# Altium PCB Stepper-Driver-v2.0.PcbDoc (part 1 of 7)
Units mil, origin at the board's own origin, x right, y up, seen from the top; angles counter-clockwise.
Board outline 5905.51 x 4330.71 mil, 4 copper layers (Top Layer, Layer 1, Layer 2, Bottom Layer), stack 62.047 mil thick; 312 components, 285 nets, 1093 pads, 969 vias.
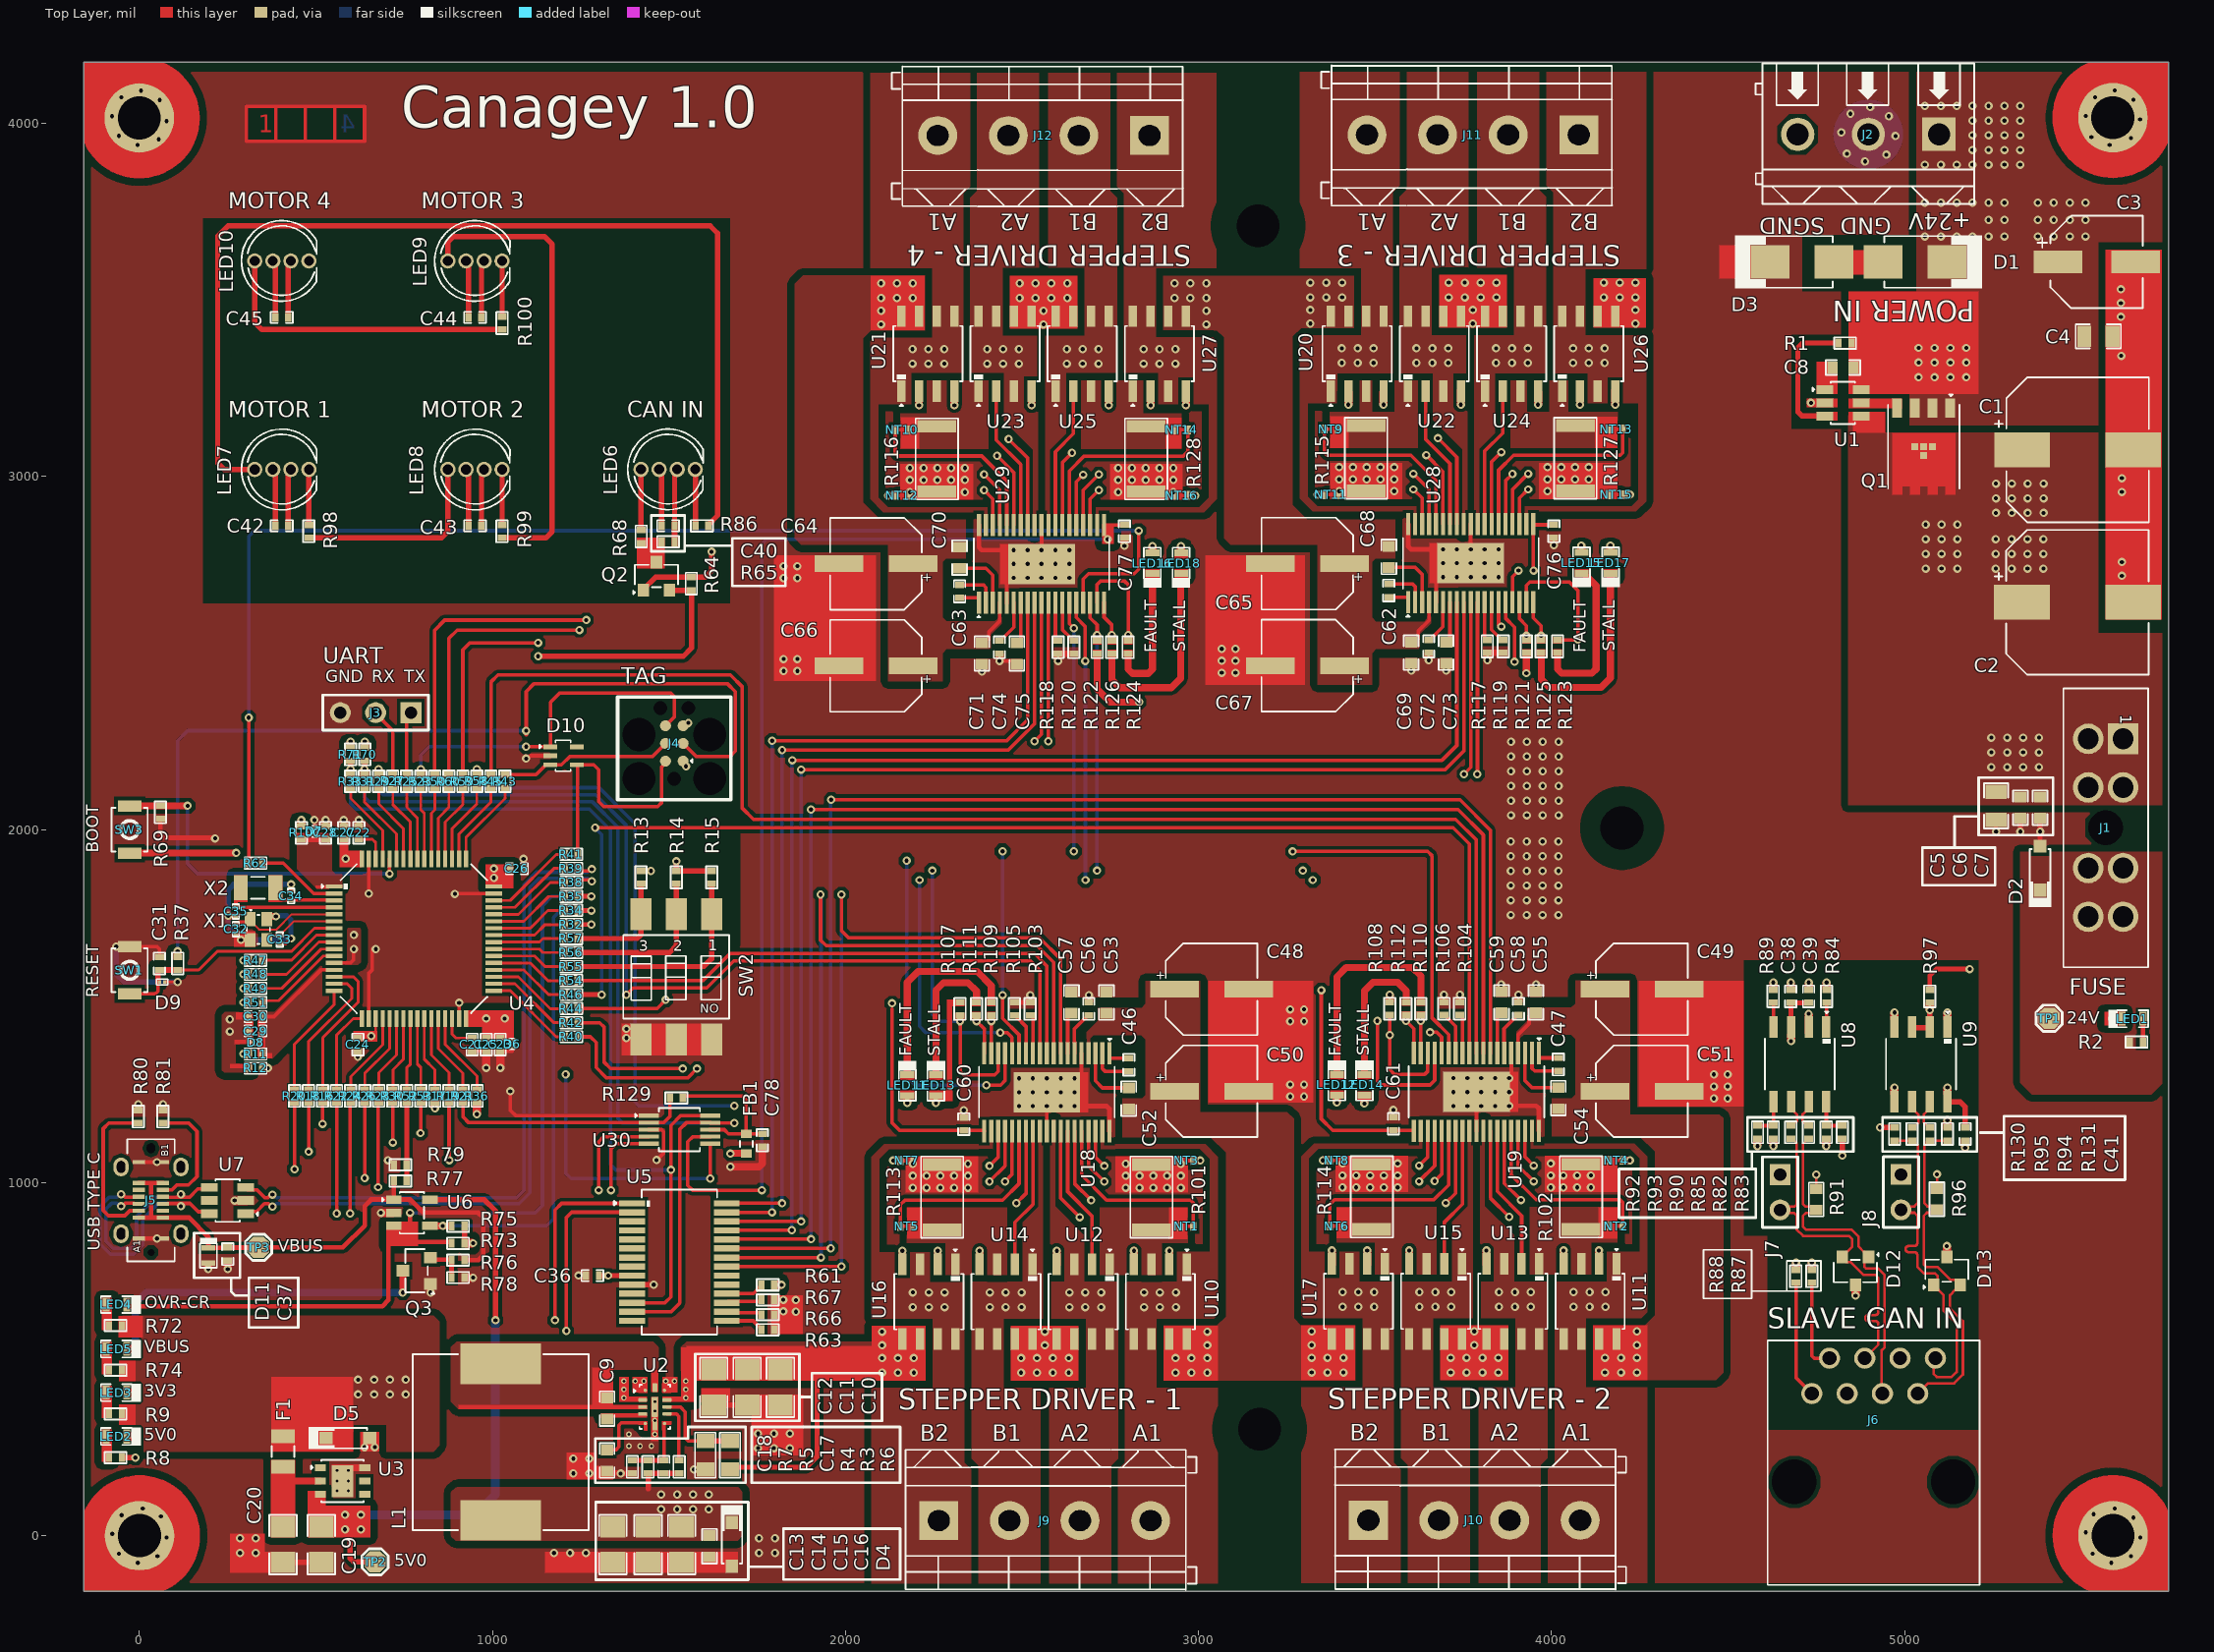
[diagram p0: Top Layer view]
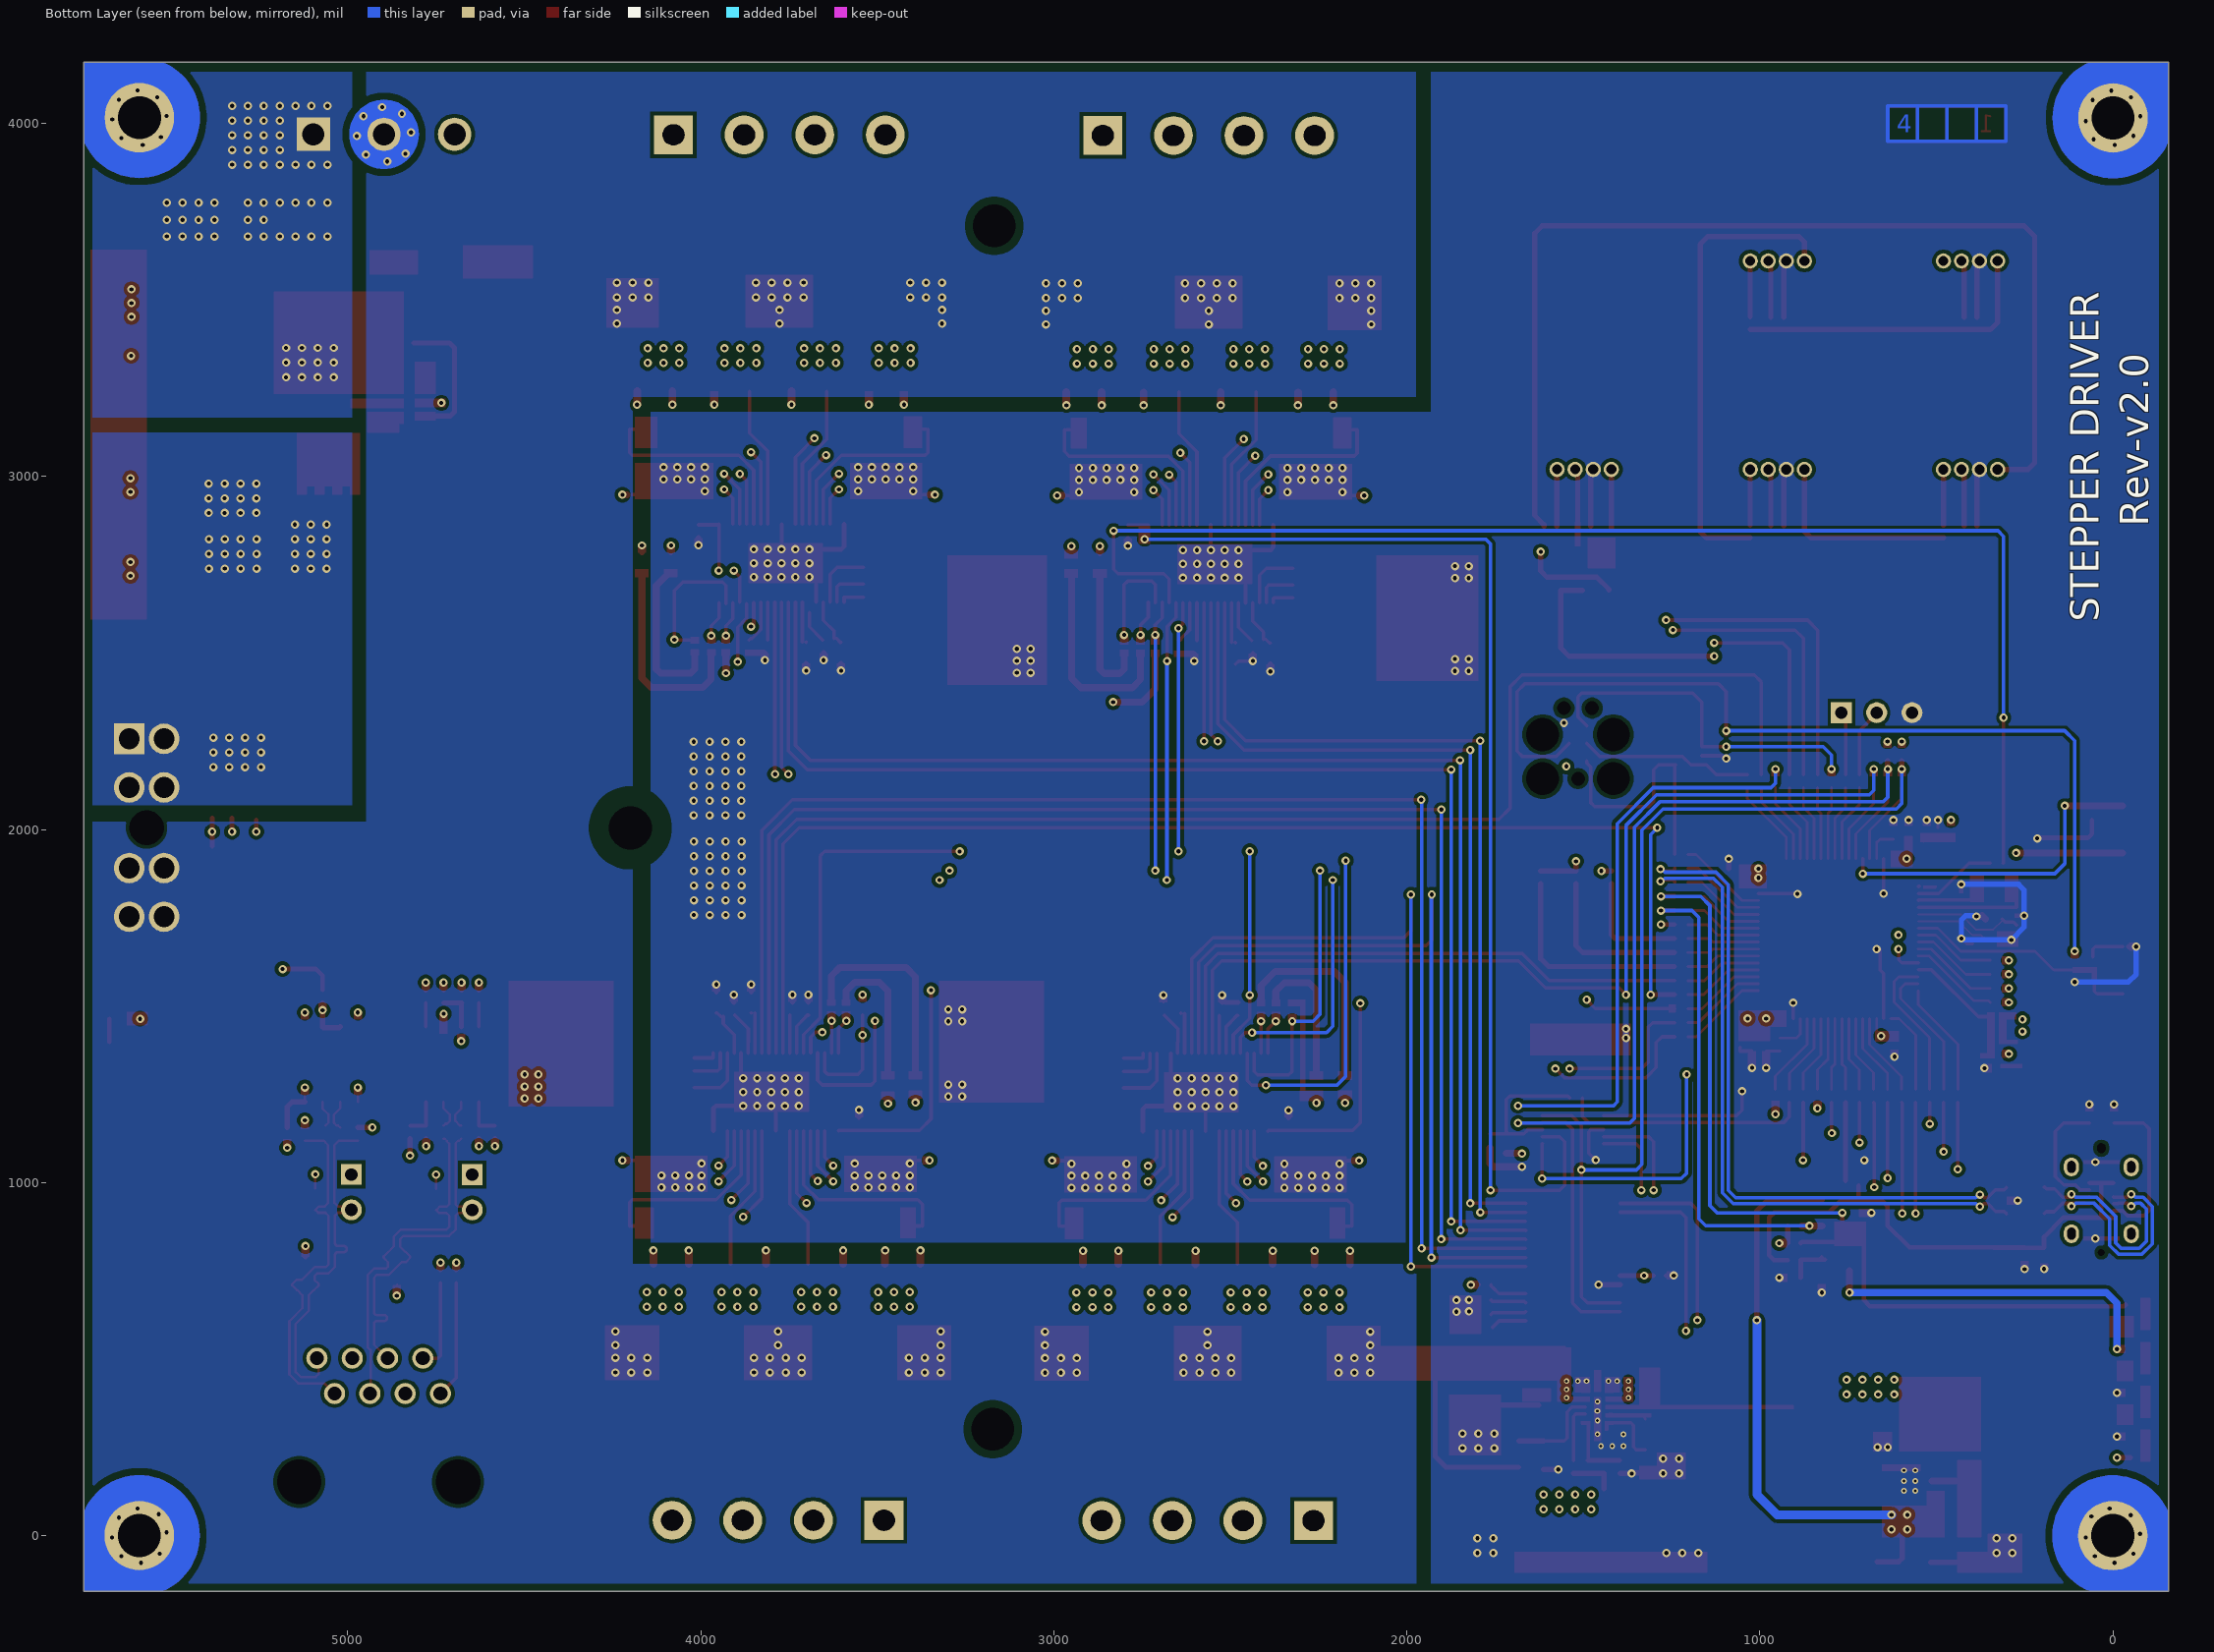
[diagram p1: Bottom Layer view, seen from below]
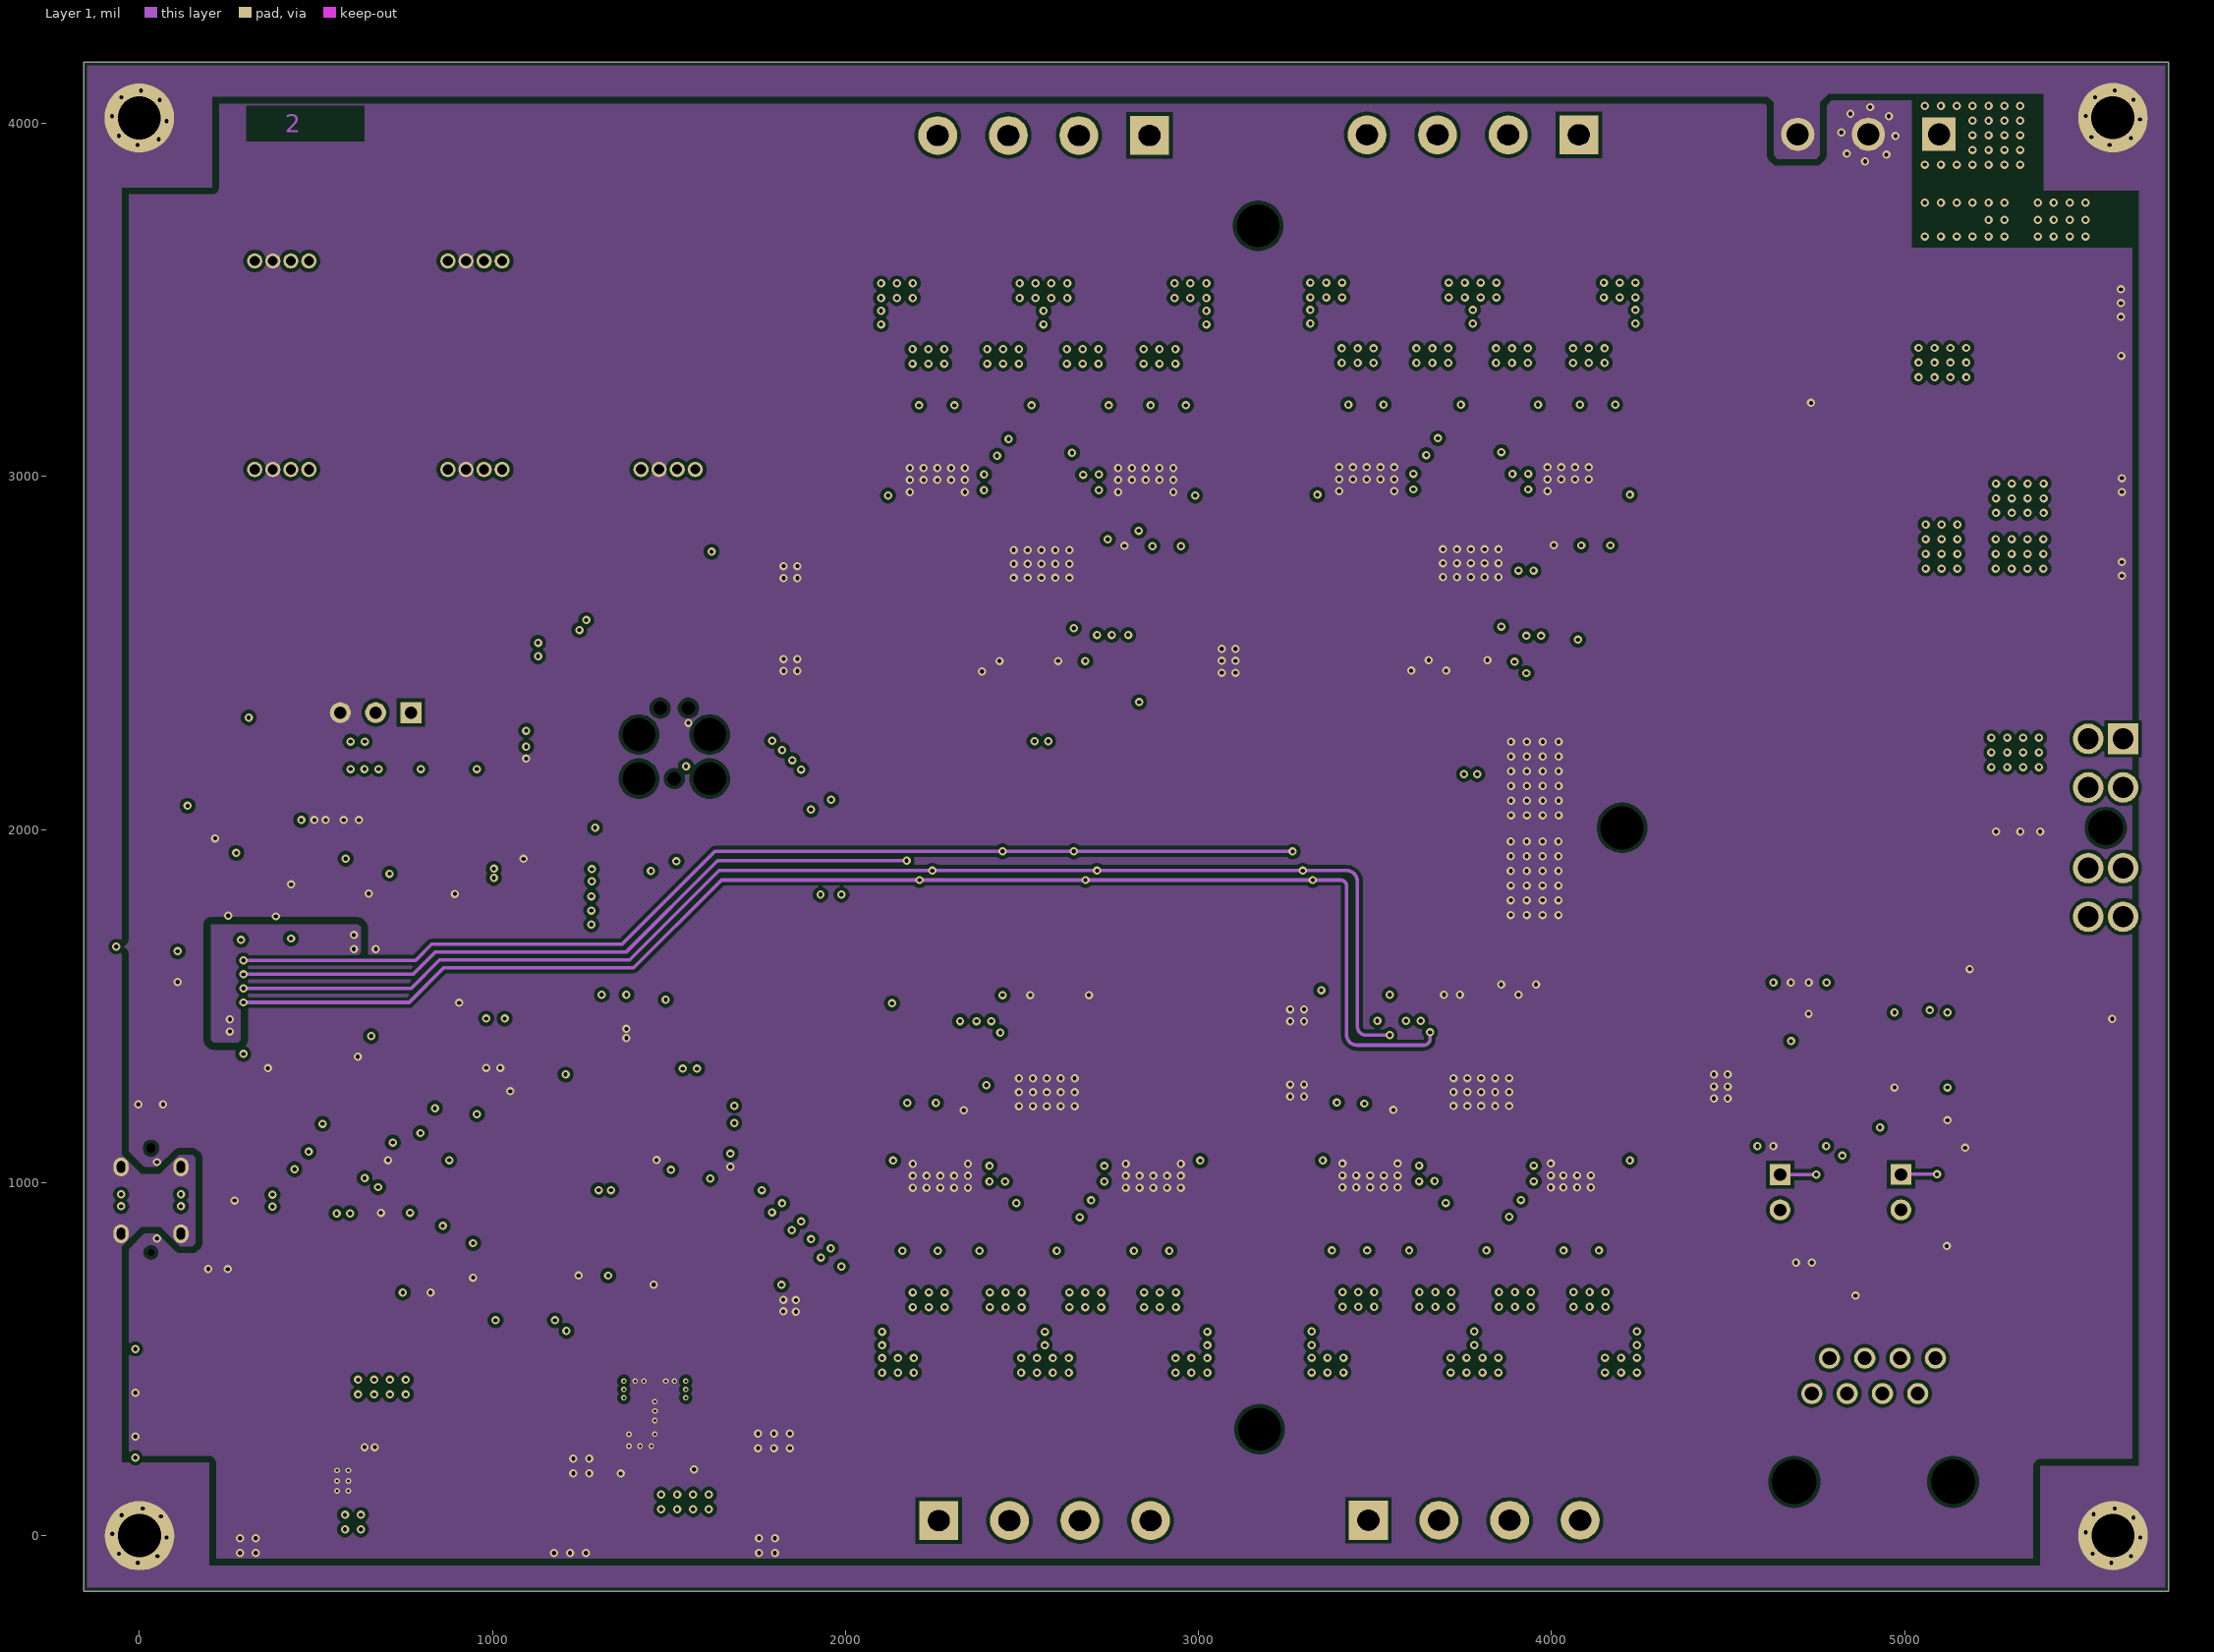
[diagram p2: Layer 1]
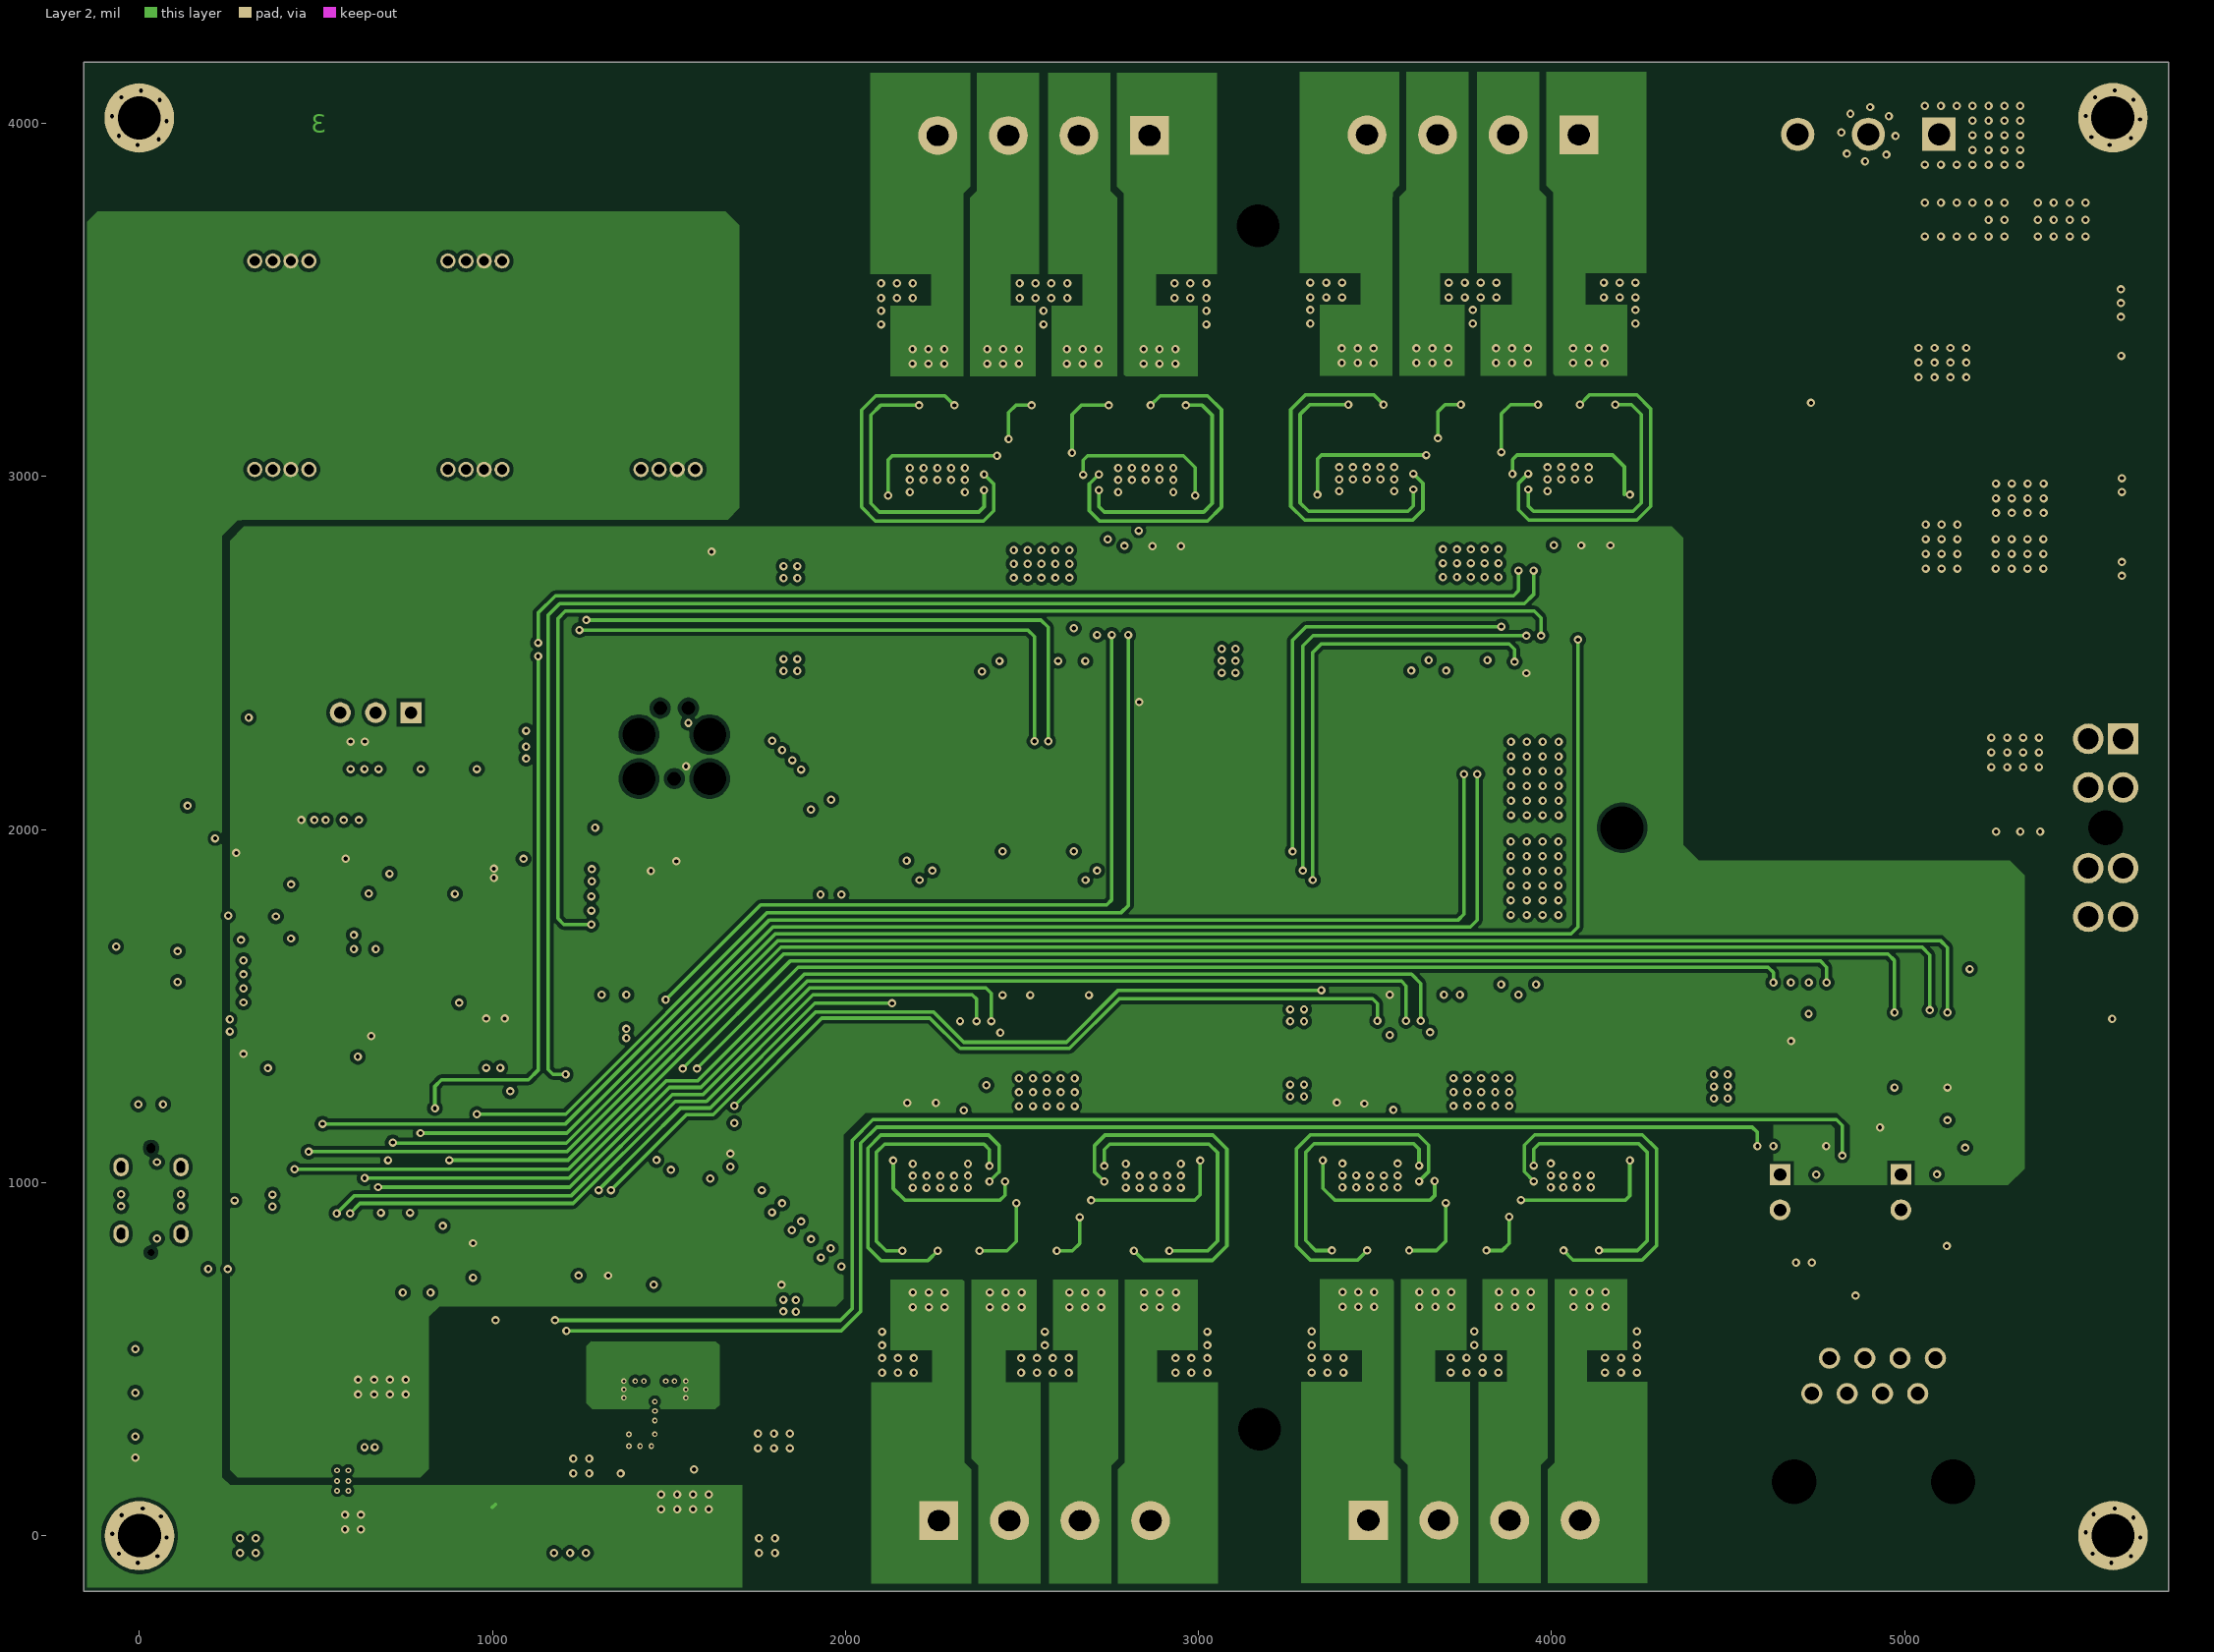
[diagram p3: Layer 2]
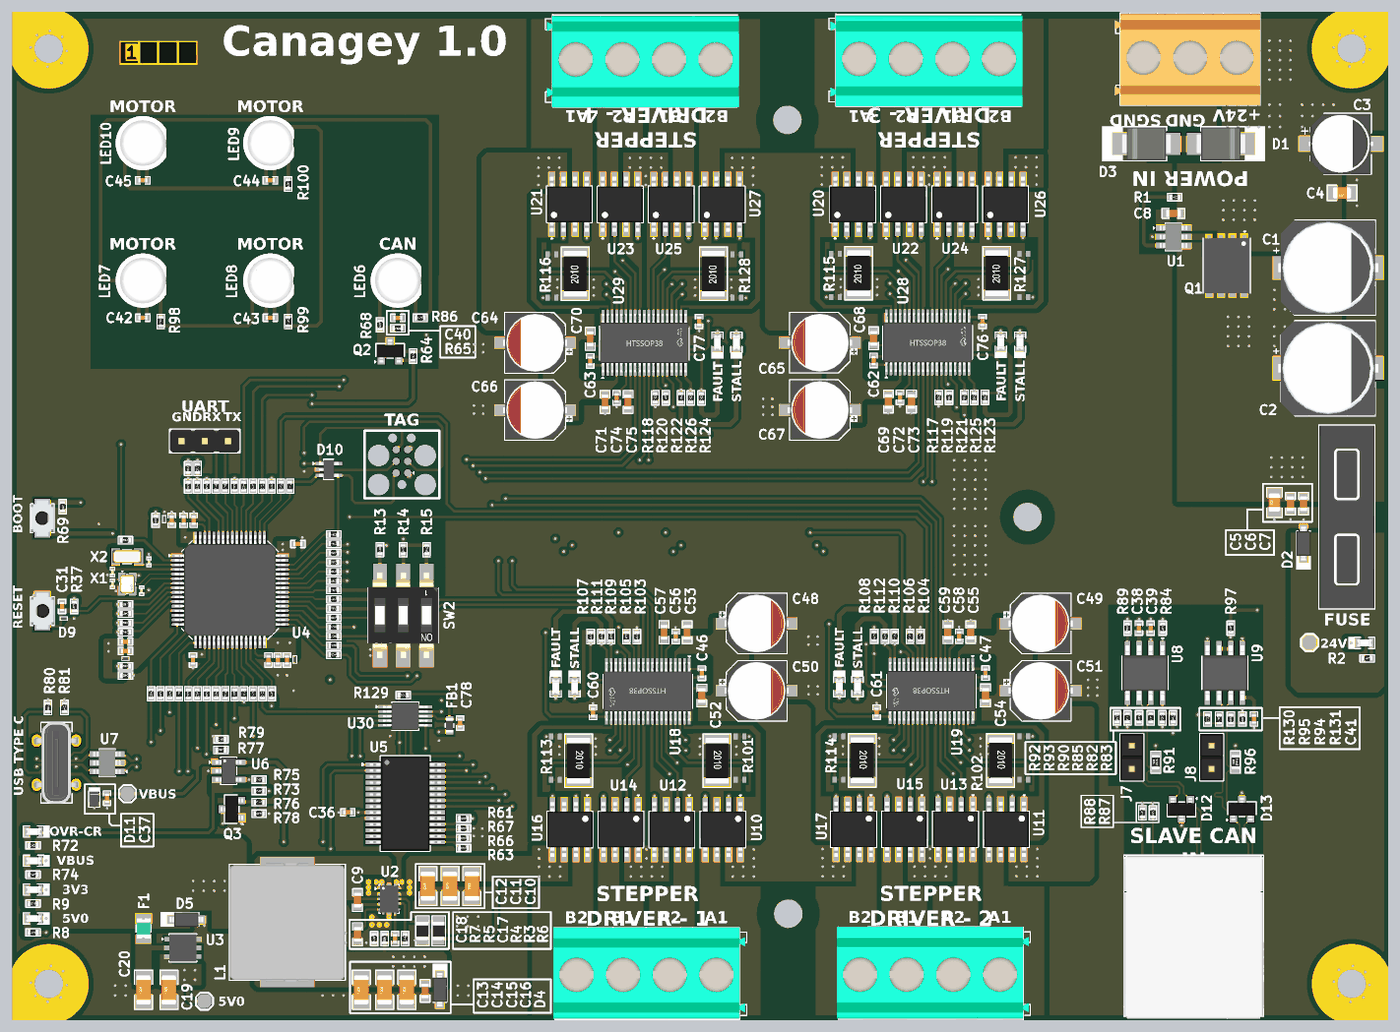
[diagram p8: 3D render of the assembled board from above, using the file's embedded part models]

## Layer stack, top to bottom
Top Solder: solder mask 0.4, Solder Resist, Dk 3.5
Top Layer: signal copper 1.378
Dielectric 2: prepreg 7.992, PP-006, Dk 4.4
Layer 1: signal copper 1.378
Dielectric 1: dielectric 40.551, FR-4, Dk 4.6
Layer 2: signal copper 1.378
Dielectric 3: prepreg 7.992, PP-006, Dk 4.4
Bottom Layer: signal copper 1.378
Bottom Solder: solder mask 0.4, Solder Resist, Dk 3.5

## Board outline
-157.85,-157.11 -157.85,4173.6 5747.66,4173.6 5747.66,-157.11

## Design rules (kind name [scope] priority, off if disabled: settings)
BoardOutlineClearance [All] p1: gap=0 ignorepadtopadclearanceinfootprint=FALSE except(10: Arc-OutlineEdge SMDPad-OutlineEdge THPad-OutlineEdge Via-OutlineEdge Fill-OutlineEdge Poly-OutlineEdge)
Clearance "Clearance_Diff Pair" [InAnyDifferentialPair] p1: gap=10 ignorepadtopadclearanceinfootprint=FALSE except(4: SMDPad-SMDPad; 5: Arc-Arc Arc-Track; 7: Arc-SMDPad Track-Track Track-SMDPad Track-Via THPad-THPad; 20: Poly-Region Region-Region)
Clearance [All] p2: gap=10 ignorepadtopadclearanceinfootprint=FALSE except(4: SMDPad-SMDPad; 7: Arc-SMDPad Arc-Fill Track-Track Track-SMDPad Track-Via Track-Fill Track-Region Track-Text SMDPad-Fill SMDPad-Region THPad-THPad Fill-Fill; 20: Fill-Poly Poly-Poly Poly-Region Region-Region)
Clearance Clearance_BOTTOM [OnLayer('Bottom Layer')] p3: gap=10 ignorepadtopadclearanceinfootprint=FALSE except(4: SMDPad-SMDPad; 7: Arc-SMDPad Track-SMDPad Track-Via THPad-THPad; 9: Track-Track; 20: Arc-Poly Track-Poly SMDPad-Poly THPad-Poly Via-Poly Fill-Poly Poly-Poly Poly-Region Region-Region)
DiffPairsRouting DIFF_USB [InDifferentialPairClass('DIFF_USB')] p1: maxlimit=10 minlimit=7 mostfreqgap=10 toplayer_maxgap=7 toplayer_prefgap=7 toplayer_minwidth=10 toplayer_maxwidth=10 toplayer_prefwidth=10 midlayer1_mingap=10 midlayer1_minwidth=7.5 midlayer1_maxwidth=7.5 midlayer1_prefwidth=7.5 midlayer2_mingap=10 midlayer2_minwidth=7.5 midlayer2_maxwidth=7.5 midlayer2_prefwidth=7.5 bottomlayer_maxgap=7 bottomlayer_prefgap=7 bottomlayer_minwidth=10 bottomlayer_maxwidth=10 bottomlayer_prefwidth=10 impedanceprofiledriven=TRUE impedanceprofileid={FF5DAFE1-98B4-493E-B4A7-3D2591EC31F9} impedanceprofilevalue=90.000000 maxuncoupledlength=500
DiffPairsRouting DIFF_CAN1 [InDifferentialPairClass('DIFF_CAN')] p2: maxlimit=15 minlimit=11 mostfreqgap=15 toplayer_maxgap=11 toplayer_prefgap=11 toplayer_minwidth=7 toplayer_maxwidth=7 toplayer_prefwidth=7 midlayer1_mingap=15 midlayer1_minwidth=4 midlayer1_maxwidth=4 midlayer1_prefwidth=4 midlayer2_mingap=15 midlayer2_minwidth=4 midlayer2_maxwidth=4 midlayer2_prefwidth=4 bottomlayer_maxgap=11 bottomlayer_prefgap=11 bottomlayer_minwidth=7 bottomlayer_maxwidth=7 bottomlayer_prefwidth=7 impedanceprofiledriven=TRUE impedanceprofileid={AF431588-A3C0-40A6-A26B-CB03469C8758} impedanceprofilevalue=120.000000 maxuncoupledlength=500
DiffPairsRouting DIFF_RS485 [InDifferentialPairClass('DIFF_RS485')] p3: maxlimit=15 minlimit=11 mostfreqgap=15 toplayer_maxgap=11 toplayer_prefgap=11 toplayer_minwidth=7 toplayer_maxwidth=7 toplayer_prefwidth=7 midlayer1_mingap=15 midlayer1_minwidth=4 midlayer1_maxwidth=4 midlayer1_prefwidth=4 midlayer2_mingap=15 midlayer2_minwidth=4 midlayer2_maxwidth=4 midlayer2_prefwidth=4 bottomlayer_maxgap=11 bottomlayer_prefgap=11 bottomlayer_minwidth=7 bottomlayer_maxwidth=7 bottomlayer_prefwidth=7 impedanceprofiledriven=TRUE impedanceprofileid={AF431588-A3C0-40A6-A26B-CB03469C8758} impedanceprofilevalue=120.000000 maxuncoupledlength=500
HoleSize [All] p1: absolutevalues=TRUE maxlimit=137.8 minlimit=1 maxpercent=80.000 minpercent=20.000
MinimumSolderMaskSliver [All] p1: minsoldermaskwidth=0
PolygonConnect [All] p1: connectstyle=Direct reliefconductorwidth=10 reliefentries=4 polygonreliefangle="90 Angle" airgapwidth=10
RoutingVias [All] p1: holewidth=11.81 width=23.62 viastyle="Through Hole" minholewidth=7.87 minwidth=15.75 maxholewidth=11.81 maxwidth=23.62
SilkToSilkClearance [All] p1: silktosilkclearance=0
SilkToSolderMaskClearance [IsPad] p1: minsilkscreentomaskgap=0 clearancetoexposedcopper=TRUE
SolderMaskExpansion [All] p1: expansion=4 istentingtop=FALSE
SupplyNets "Schematic Supply Nets_9" [InNet('3V3')] p1: voltage=0.000
SupplyNets "Schematic Supply Nets_8" [InNet('VIN')] p2: voltage=0.000
SupplyNets "Schematic Supply Nets_7" [InNet('GND')] p3: voltage=0.000
SupplyNets "Schematic Supply Nets_6" [InNet('24V')] p4: voltage=0.000
SupplyNets "Schematic Supply Nets_5" [InNet('AGND')] p5: voltage=0.000
SupplyNets "Schematic Supply Nets_4" [InNet('5V')] p6: voltage=0.000
SupplyNets "Schematic Supply Nets_3" [InNet('AVDD')] p7: voltage=0.000
SupplyNets "Schematic Supply Nets_2" [InNet('SHGND')] p8: voltage=0.000
SupplyNets "Schematic Supply Nets_1" [InNet('VBAT')] p9: voltage=0.000
SupplyNets "Schematic Supply Nets" [InNet('VBUSc')] p10: voltage=0.000
Width [All] p1: maxlimit=50 minlimit=4 preferedwidth=6 midlayer1_maxwidth=10 midlayer2_maxwidth=10 minimp=50.000000 maximp=50.000000 favimp=50.000000
25 further rules are at their usual default settings.

## Classes and differential pairs
differential pair class DIFF_USB: USB USB_FS
differential pair class DIFF_RS485: RS485
differential pair class DIFF_CAN: CAN1
component class U_USB-Sheet: C37 D11 J5 LED4 LED5 Q3 R72 R73 R74 R75 R76 R77 R78 R79 R80 R81 TP3 U6 U7
component class U_Stepper-Driver-Sheet: C46 C47 C48 C49 C50 C51 C52 C53 C54 C55 C56 C57 C58 C59 C60 C61 C62 C63 C64 C65 C66 C67 C68 C69 C70 C71 C72 C73 C74 C75 C76 C77 C78 FB1 J9 J10 J11 J12 LED11 LED12 LED13 LED14 LED15 LED16 LED17 LED18 NT1 NT2 NT3 NT4 NT5 NT6 NT7 NT8 NT9 NT10 NT11 NT12 NT13 NT14 NT15 NT16 R101 R102 R103 R104 R105 R106 R107 R108 R109 R110 R111 R112 R113 R114 R115 R116 R117 R118 R119 R120 R121 R122 R123 R124 R125 R126 R127 R128 R129 U10 U11 U12 U13 U14 U15 U16 U17 U18 U19 U20 U21 U22 U23 U24 U25 U26 U27 U28 U29 U30
component class U_Power-Sheet: C1 C2 C3 C4 C5 C6 C7 C8 C9 C10 C11 C12 C13 C14 C15 C16 C17 C18 C19 C20 D1 D2 D3 D4 D5 F1 J1 J2 L1 LED1 LED2 LED3 Q1 R1 R2 R3 R4 R5 R6 R7 R8 R9 TP1 TP2 U1 U2 U3
component class U_Controller-Sheet-2: C31 C32 C33 C34 C35 C36 D9 D10 J3 J4 Q2 R13 R14 R15 R16 R17 R18 R19 R20 R21 R22 R23 R24 R25 R26 R27 R28 R29 R30 R31 R32 R33 R34 R35 R36 R37 R38 R39 R40 R41 R42 R43 R44 R45 R46 R47 R48 R49 R50 R51 R52 R53 R54 R55 R56 R57 R58 R59 R60 R61 R62 R63 R64 R65 R66 R67 R68 R69 R70 R71 SW1 SW2 SW3 U5 X1 X2
component class U_Controller-Sheet-1: C21 C22 C23 C24 C25 C26 C27 C28 C29 C30 D6 D7 D8 R10 R11 R12 U4
component class U_Comms-Sheet: C38 C39 C40 C41 C42 C43 C44 C45 D12 D13 J6 J7 J8 LED6 LED7 LED8 LED9 LED10 R82 R83 R84 R85 R86 R87 R88 R89 R90 R91 R92 R93 R94 R95 R96 R97 R98 R99 R100 R130 R131 U8 U9
differential pair USB: +USB_P -USB_N
differential pair USB_FS: +USB_FS_P -USB_FS_N
differential pair RS485: +RS485_P -RS485_N
differential pair CAN1: +CAN1_P -CAN1_N

## Components (designator, comment, footprint, x,y, rotation, side; value= is the part's Value field where it differs from the comment)
C1 "220uF" UCD-220uF-10mmDia 5489.81,3075.63 r0 top
C2 "220uF" UCD-220uF-10mmDia 5489.39,2643.84 r0 top
C3 "47uF" RVT1H470M0607 5543.85,3607.84 r0 top
C4 "22nF" Cap-0805 5548.59,3397.14 r180 top
C5 "10uF" Cap-0805 5258.59,2067.15 r90 top
C6 "1uF" Cap-0603 5327.59,2062.14 r90 top
C7 "0.1uF" Cap-0603 5383.59,2062.14 r90 top value=100nF
C8 "1uF" Cap-0603 4825.21,3308.52 r0 top
C9 "0.1uF" Cap-0603 1324.19,360.18 r270 top value=100nF
C10 "4.7uF" Cap-1206 1815.33,420.07 r90 top
C11 "220nF" Cap-1206 1721.19,420.1 r90 top
C12 "220nF" Cap-1206 1626.22,420.07 r90 top
C13 "47uF" Cap-1206 1340.82,-25.12 r90 top
C14 "47uF" Cap-1206 1440.82,-25.12 r90 top
C15 "47uF" Cap-1206 1535.82,-25.12 r90 top
C16 "0.1uF" Cap-0603 1614.33,-29.93 r90 top value=100nF
C17 "6.8pF" Cap-0402 1485.29,194.84 r270 top
C18 "1uF" Cap-0603 1324.19,212.84 r90 top
C19 "4.7uF" Cap-1206 515.33,-25.12 r90 top
C20 "4.7uF" Cap-1206 406.17,-25.12 r90 top
C21 "2.2uf" Cap-0402 942.12,1391.16 r270 top
C22 "2.2uf" Cap-0402 621.47,1991.16 r90 top
C23 "4.7uF" Cap-0402 1021.8,1391.16 r90 top
C24 "0.1uF" Cap-0402 618.33,1391.16 r90 top value=100nF
C25 "0.1uF" Cap-0402 981.93,1391.16 r90 top value=100nF
C26 "0.1uF" Cap-0402 1068.77,1889.13 r180 top value=100nF
C27 "0.1uF" Cap-0402 578.48,1991.16 r270 top value=100nF
C28 "1uF" Cap-0402 527.21,1991.16 r270 top
C29 "1uF" Cap-0402 328.61,1429.72 r0 top
C30 "0.1uF" Cap-0402 328.62,1470.22 r0 top value=100nF
C31 "0.1uF" Cap-0402 56.53,1620.87 r270 top value=100nF
C32 "15pF" Cap-0201 272.84,1717.96 r90 top
C33 "15pF" Cap-0201 397.72,1688.75 r90 top
C34 "15pF" Cap-0201 429.2,1812.18 r270 top
C35 "15pF" Cap-0201 272.84,1768.06 r90 top
C36 "0.1uF" Cap-0402 1282.83,736.68 r180 top value=100nF
C37 "4.7uF" Cap-0402 249.83,797.57 r270 top
C38 "0.1uF" Cap-0402 4677.45,1527.73 r270 top value=100nF
C39 "4.7uF" Cap-0402 4727.95,1527.73 r270 top
C40 "0.1uF" Cap-0402 1497.21,2860.28 r0 top value=100nF
C41 "0.1uF" Cap-0402 5171.25,1137.73 r90 top value=100nF
C42 "0.1uF" Cap-0402 403.04,2860.63 r0 top value=100nF
C43 "0.1uF" Cap-0402 950.17,2860.63 r0 top value=100nF
C44 "0.1uF" Cap-0402 950.17,3450.63 r0 top value=100nF
C45 "0.1uF" Cap-0402 403.04,3450.63 r0 top value=100nF
C46 "100nF" cap-0402 2802,1333.92 r90 top
C47 "100nF" cap-0402 4018.85,1334.78 r90 top
C48 "100uF" SVZ1VM101E09E00RAXXX 3036.72,1547.76 r0 top
C49 "100uF" SVZ1VM101E09E00RAXXX 4255.58,1547.76 r0 top
C50 "100uF" SVZ1VM101E09E00RAXXX 3036.72,1258.77 r0 top
C51 "100uF" SVZ1VM101E09E00RAXXX 4255.58,1258.77 r0 top
C52 "1uF" Cap-0603 2802.01,1238.41 r270 top
C53 "1uF" Cap-0603 2738.69,1510.04 r270 top
C54 "1uF" Cap-0603 4018.85,1239.27 r270 top
C55 "1uF" Cap-0603 3955.53,1510.9 r270 top
C56 "100nF" cap-0402 2689.1,1492.05 r90 top
C57 "1uF" Cap-0603 2639.91,1510.05 r270 top
C58 "100nF" cap-0402 3905.94,1492.91 r90 top
C59 "1uF" Cap-0603 3857.75,1510.91 r270 top
C60 "1nF" Cap-0402 2334.88,1165.91 r90 top
C61 "1nF" Cap-0402 3551.72,1166.77 r90 top
C62 "100nF" cap-0402 3538.87,2676.91 r270 top
C63 "100nF" cap-0402 2322.89,2674.77 r270 top
C64 "100uF" SVZ1VM101E09E00RAXXX 2086.15,2752.92 r180 top
C65 "100uF" SVZ1VM101E09E00RAXXX 3308.11,2753.34 r180 top
C66 "100uF" SVZ1VM101E09E00RAXXX 2086.15,2463.93 r180 top
C67 "100uF" SVZ1VM101E09E00RAXXX 3308.11,2464.35 r180 top
C68 "1uF" Cap-0603 3538.87,2772.41 r90 top
C69 "1uF" Cap-0603 3602.19,2500.78 r90 top
C70 "1uF" Cap-0603 2322.89,2770.27 r90 top
C71 "1uF" Cap-0603 2386.2,2498.64 r90 top
C72 "100nF" cap-0402 3651.78,2518.78 r270 top
C73 "1uF" Cap-0603 3700.96,2500.78 r90 top
C74 "100nF" cap-0402 2435.79,2516.64 r270 top
C75 "1uF" Cap-0603 2484.98,2498.64 r90 top
C76 "1nF" Cap-0402 4006,2844.92 r270 top
C77 "1nF" Cap-0402 2790.02,2844.91 r270 top
C78 "100nF" cap-0402 1764.33,1120.07 r270 top
D1 "SMBJ58A-13-F" SMB_ 5029.24,3607.92 r0 top
D2 "AZ4024-01G" SOD-123 5383.59,1891 r270 top
D3 "SMBJ26A-13-F" SMB_ 4709.37,3607.92 r180 top
D4 "AZ3005-01G" SOD-123 1677.91,-24.84 r90 top
D5 "AZ3003-01G" SOD-123 590.05,276.61 r180 top
D6 "ESDM2033MX4T5G" DFN-2(0.3x0.6) 1055.34,1392.9 r90 top
D7 "ESDM2033MX4T5G" DFN-2(0.3x0.6) 495.28,1995.44 r270 top
D8 "ESDM2033MX4T5G" DFN-2(0.3x0.6) 328.84,1397.16 r0 top
D9 "ESDM2033MX4T5G" DFN-2(0.3x0.6) 64.21,1568.55 r180 top
D10 "ESDALC6V1W5" SOT-323-5 1201.33,2209.07 r0 top
D11 "ESDA7P60-1U1M" "Diode 1610" 194.83,793.57 r270 top
D12 "CDSOT23-T24CAN-Q" SOT-23 4860.29,750.07 r180 top
D13 "SM712" SOT-23 5119.33,750.07 r0 top
F1 "0805L110SLYR" Fuse-0805 406.13,238.16 r90 top
FB1 "BLM18PG221SN1D" "IND-0603 (1608 Metric)" 1719,1110.7 r270 top value=100mR
J1 "178.6165.0002" 178.6165.0002 5569.38,2005.17 r270 top
J2 "DB128L-5.08-3P-OG-S" DB128L-5.08-3P-OG-S 4896.96,3969.34 r180 top
J3 "X6511WV-03H-C60D30" HDR1X3_ 768.76,2331.16 r180 top
J4 "TC2030-IDC" TC2030-IDC_ 1514.89,2244.11 r90 top
J5 "U263-163N-4BQC65" U263-163N-4BQC65 32.4,949.91 r90 top locked
J6 "HC-RJ45-5622-1-6-Y" HC-RJ45-5622-1-6-Y 4911.95,327.73 r0 top
J7 "X6511WV-02H-C60D30" HDR1X2_ 4646.95,1022.73 r270 top
J8 "X6511WV-02H-C60D30" HDR1X2_ 4989.33,1023.07 r270 top
J9 "DB128L-5.08-4P-GN-S" DB128L-5.08-4P-GN-S 2564,42.77 r0 top
J10 "DB128L-5.08-4P-GN-S" DB128L-5.08-4P-GN-S 3780.84,43.63 r0 top
J11 "DB128L-5.08-4P-GN-S" DB128L-5.08-4P-GN-S 3776.88,3968.06 r180 top
J12 "DB128L-5.08-4P-GN-S" DB128L-5.08-4P-GN-S 2560.9,3965.92 r180 top
L1 "15uH" SRP1265A-150M 1022.99,265.03 r90 top
LED1 "RED" LED-0603 5645.39,1464.3 r180 top
LED2 "RED" LED-0603 -65.39,281.07 r0 top
LED3 "RED" LED-0603 -65.39,405.18 r0 top
LED4 "RED" LED-0603 -65.39,654.62 r0 top
LED5 "Emerald" LED-0603 -65.39,529 r0 top
LED6 "WS2812D-F5" WS2812D-F5 1497.33,3020.28 r0 top
LED7 "WS2812D-F5" WS2812D-F5 403.04,3020.08 r0 top
LED8 "WS2812D-F5" WS2812D-F5 950.28,3020.08 r0 top
LED9 "WS2812D-F5" WS2812D-F5 950.28,3610.63 r0 top
LED10 "WS2812D-F5" WS2812D-F5 403.04,3610.63 r0 top
LED11 "RED" LED-0603 2174.77,1276.15 r90 top
LED12 "RED" LED-0603 3391.62,1277.01 r90 top
LED13 "NCD0603O2" LED-0603 2255.88,1276.15 r90 top
LED14 "NCD0603O2" LED-0603 3469.72,1277.01 r90 top
LED15 "RED" LED-0603 4084.65,2755.54 r270 top
LED16 "RED" LED-0603 2869.02,2754.68 r270 top
LED17 "NCD0603O2" LED-0603 4166.97,2755.54 r270 top
LED18 "NCD0603O2" LED-0603 2950.12,2754.68 r270 top
NT1 "Net Tie_SMD" "Net Tie Pad" 2965.88,876.39 r180 top net-tie
NT2 "Net Tie_SMD" "Net Tie Pad" 4182.72,877.25 r180 top net-tie
NT3 "Net Tie_SMD" "Net Tie Pad" 2965.88,1062.43 r180 top net-tie
NT4 "Net Tie_SMD" "Net Tie Pad" 4182.72,1063.29 r180 top net-tie
NT5 "Net Tie_SMD" "Net Tie Pad" 2173.58,876.39 r0 top net-tie
NT6 "Net Tie_SMD" "Net Tie Pad" 3390.42,877.25 r0 top net-tie
NT7 "Net Tie_SMD" "Net Tie Pad" 2173.58,1062.43 r0 top net-tie
NT8 "Net Tie_SMD" "Net Tie Pad" 3390.42,1063.29 r0 top net-tie
NT9 "Net Tie_SMD" "Net Tie Pad" 3375,3134.44 r0 top net-tie
NT10 "Net Tie_SMD" "Net Tie Pad" 2159.01,3132.29 r0 top net-tie
NT11 "Net Tie_SMD" "Net Tie Pad" 3375,2948.4 r0 top net-tie
NT12 "Net Tie_SMD" "Net Tie Pad" 2159.01,2946.25 r0 top net-tie
NT13 "Net Tie_SMD" "Net Tie Pad" 4182.72,3134.44 r180 top net-tie
NT14 "Net Tie_SMD" "Net Tie Pad" 2951.31,3132.29 r180 top net-tie
NT15 "Net Tie_SMD" "Net Tie Pad" 4182.72,2948.4 r180 top net-tie
NT16 "Net Tie_SMD" "Net Tie Pad" 2951.31,2946.25 r180 top net-tie
Q1 "CSD18532Q5BT" SON-8(5x6) 5053.97,3139.26 r270 top
Q2 "Si2302CDS" Sot-23 1464.22,2717.71 r0 top
Q3 "MMBT3904" SOT-23 785.07,750.47 r90 top
R1 "100K" Res-0402 4831.24,3378.38 r0 top
R2 "3.9K" Res-0402 5656.33,1398.3 r0 top value=3.9kR
R3 "698K" RES-0805 1672.58,227.84 r270 top value=698kR
R4 "100K" Res-0402 1528.19,194.84 r90 top
R5 "100K" Res-0402 1440.79,194.84 r270 top
R6 "51.1K" RES-0805 1602.72,227.84 r90 top value=51.1kR
R7 "24.9K" Res-0402 1395.78,194.84 r90 top
R8 "499R" Res-0402 -67.71,221.07 r180 top
R9 "240R" Res-0402 -67.71,345.27 r180 top
R10 "0R" Res-0402 458.24,1991.16 r270 top
R11 "0R" Res-0402 328.75,1364.34 r180 top
R12 "0R" Res-0402 328.75,1324.16 r180 top
R13 "10K" Res-0402 1420.48,1864.79 r90 top
R14 "10K" Res-0402 1520.48,1864.8 r90 top
R15 "10K" Res-0402 1620.48,1864.79 r90 top
R16 "0R" Res-0402 518.81,1245.63 r270 top
R17 "0R" Res-0402 836.65,1245.51 r90 top
R18 "0R" Res-0402 479.04,1245.63 r270 top
R19 "0R" Res-0402 876.41,1245.51 r90 top
R20 "0R" Res-0402 438.94,1245.63 r270 top
R21 "0R" Res-0402 916.17,1245.51 r90 top
R22 "0R" Res-0402 558.3,1245.51 r270 top
R23 "0R" Res-0402 796.49,2136.81 r270 top
R24 "0R" Res-0402 598.07,1245.51 r270 top
R25 "0R" Res-0402 756.73,2136.81 r270 top
R26 "0R" Res-0402 637.83,1245.51 r270 top
R27 "0R" Res-0402 716.96,2136.81 r270 top
R28 "0R" Res-0402 677.59,1245.51 r270 top
R29 "0R" Res-0402 677.2,2136.81 r270 top
R30 "0R" Res-0402 717.36,1245.51 r270 top
R31 "0R" Res-0402 637.44,2136.81 r270 top
R32 "0R" Res-0402 1222.86,1731.32 r0 top
R33 "0R" Res-0402 597.68,2136.81 r270 top
R34 "0R" Res-0402 1222.86,1771.08 r0 top
R35 "0R" Res-0402 1222.86,1810.85 r0 top
R36 "0R" Res-0402 955.94,1245.51 r90 top
R37 "0R" Res-0402 108.33,1620.87 r270 top
R38 "0R" Res-0402 1222.86,1850.61 r0 top
R39 "0R" Res-0402 1222.86,1890.37 r0 top
R40 "0R" Res-0402 1222.86,1413.21 r180 top
R41 "0R" Res-0402 1222.86,1930.14 r0 top
R42 "0R" Res-0402 1222.86,1452.97 r180 top
R43 "0R" Res-0402 1035.08,2136.81 r90 top
R44 "0R" Res-0402 1222.86,1492.74 r180 top
R45 "0R" Res-0402 995.31,2136.81 r90 top
R46 "0R" Res-0402 1222.86,1532.5 r180 top
R47 "0R" Res-0402 328.84,1629.69 r180 top
R48 "0R" Res-0402 328.84,1589.92 r180 top
R49 "0R" Res-0402 328.84,1550.16 r180 top
R50 "0R" Res-0402 836.26,2136.81 r270 top
R51 "0R" Res-0402 328.84,1510.4 r180 top
R52 "0R" Res-0402 757.12,1245.51 r270 top
R53 "0R" Res-0402 796.88,1245.51 r270 top
R54 "0R" Res-0402 1222.86,1572.26 r0 top
R55 "0R" Res-0402 1222.86,1612.03 r0 top
R56 "0R" Res-0402 1222.86,1651.79 r0 top
R57 "0R" Res-0402 1222.86,1691.56 r0 top
R58 "0R" Res-0402 955.55,2136.81 r90 top
R59 "0R" Res-0402 915.79,2136.81 r90 top
R60 "0R" Res-0402 876.02,2136.81 r90 top
R61 "10K" Res-0402 1779.33,710.54 r0 top
R62 "0R" Res-0402 328.84,1905.3 r180 top
R63 "10K" Res-0402 1779.33,583.45 r0 top
R64 "10K" Res-0402 1563.1,2696.45 r90 top
R65 "10K" Res-0402 1497.21,2814.98 r0 top
R66 "10K" Res-0402 1779.33,625.81 r0 top
R67 "10K" Res-0402 1779.33,668.18 r0 top
R68 "75R" Res-0402 1420.81,2829.98 r90 top
R69 "10K" Res-0402 59.33,2049.07 r90 top
R70 "4.7K" Res-0402 637.84,2213.31 r270 top
R71 "4.7K" Res-0402 597.68,2213.31 r270 top
R72 "240R" Res-0402 -67.71,595.07 r0 top
R73 "47K" Res-0402 902.33,828.68 r0 top
R74 "240R" Res-0402 -67.71,469.18 r0 top
R75 "47K" Res-0402 902.33,877.29 r0 top
R76 "4.7K" Res-0402 902.34,780.66 r180 top
R77 "200K" Res-0402 738.54,1004.84 r180 top value=200kR
R78 "47K" Res-0402 902.33,731.08 r180 top
R79 "309K" Res-0402 738.54,1050.16 r0 top value=309kR
R80 "5.1K" Res-0402 -3.67,1187.07 r90 top
R81 "5.1K" Res-0402 66.46,1187.07 r90 top
R82 "10K" Res-0402 4777.95,1142.73 r270 top
R83 "0R" Res-0402 4822.94,1142.73 r90 top
R84 "0R" Res-0402 4778.95,1527.73 r270 top
R85 "0R" Res-0402 4727.95,1142.73 r270 top
R86 "75R" Res-0402 1593,2860.29 r0 top
R87 "0R" Res-0402 4736.95,734.75 r270 top
R88 "0R" Res-0402 4691.95,734.75 r270 top
R89 "0R" Res-0402 4627.95,1527.73 r270 top
R90 "0R" Res-0402 4677.95,1142.73 r270 top
R91 "120R" Res-0603 4749.33,952.26 r270 top
R92 "0R" Res-0402 4582.95,1142.73 r90 top
R93 "10K" Res-0402 4627.95,1142.73 r90 top
R94 "0R" Res-0402 5071.25,1137.73 r270 top
R95 "0R" Res-0402 5021.25,1137.73 r270 top
R96 "120R" Res-0603 5091.24,953.07 r270 top
R97 "10K" Res-0402 5071.25,1527.73 r90 top
R98 "75R" Res-0402 479.81,2844.63 r270 top
R99 "75R" Res-0402 1027.05,2844.63 r270 top
R100 "75R" Res-0402 1027.05,3434.63 r270 top
R101 "50mR" RES-2010 2866.4,958.91 r270 top
R102 "50mR" RES-2010 4083.24,959.77 r270 top
R103 "0R" Res-0402 2523.01,1492.04 r270 top
R104 "0R" Res-0402 3739.85,1492.9 r270 top
R105 "0R" Res-0402 2478.23,1492.04 r270 top
R106 "0R" Res-0402 3695.07,1492.9 r270 top
R107 "3.3K" Res-0402 2324.45,1492.04 r270 top
R108 "3.3K" Res-0402 3541.29,1492.9 r270 top
R109 "200R" Res-0402 2412.66,1492.04 r270 top
R110 "200R" Res-0402 3629.51,1492.9 r270 top
R111 "200R" Res-0402 2370.88,1492.04 r270 top
R112 "200R" Res-0402 3587.72,1492.9 r270 top
R113 "50mR" RES-2010 2273.58,958.91 r270 top
R114 "50mR" RES-2010 3490.42,959.77 r270 top
R115 "50mR" RES-2010 3474.48,3051.92 r90 top
R116 "50mR" RES-2010 2258.49,3049.78 r90 top
R117 "0R" Res-0402 3817.87,2518.78 r90 top
R118 "0R" Res-0402 2601.89,2516.64 r90 top
R119 "0R" Res-0402 3862.65,2518.78 r90 top
R120 "0R" Res-0402 2646.67,2516.64 r90 top
R121 "3.3K" Res-0402 3928.36,2518.78 r90 top
R122 "3.3K" Res-0402 2712.38,2516.64 r90 top
R123 "200R" Res-0402 4016.43,2518.78 r90 top
R124 "200R" Res-0402 2800.45,2516.64 r90 top
R125 "200R" Res-0402 3970,2518.78 r90 top
R126 "200R" Res-0402 2754.02,2516.64 r90 top
R127 "50mR" RES-2010 4067.3,3051.92 r90 top
R128 "50mR" RES-2010 2851.31,3049.78 r90 top
R129 "10K" Res-0402 1520.48,1240.07 r180 top
R130 "560R" Res-0402 4971.25,1137.73 r90 top
R131 "560R" Res-0402 5121.25,1137.73 r90 top
SW1 "B3U-1000P" B3U-1000P -27.96,1601.57 r90 top
SW2 "DSIC03LSGET" DSIC03LSGET 1520.48,1583 r270 top
SW3 "B3U-1000P" B3U-1000P -27.96,2000.07 r270 top
TP1 "TEST POINT" Test-point 5409.33,1465.77 r0 top
TP2 "TEST POINT" Test-point 667.33,-73.93 r0 top
TP3 "TEST POINT" Test-point 337.4,816.91 r0 top
U1 "LM74700QDBVRQ1" SOT-23-6 4825.21,3208.53 r0 top
U2 "LM60440AQRPKRQ1" "13-WQFN-HR (3x2)" 1459.74,364.86 r0 top
U3 "ST1L05APU33R" DFN-6(3x3) 575.05,154.86 r0 top
U4 "STM32H503RBT6" "64-LQFP (10x10)" 777.21,1691.16 r0 top locked
U5 "MCP23017T-E/SS" SSOP-28-208mil 1529.33,775.07 r0 top
U6 "STMPS2161STR" SOT-23-5 771.33,914.69 r0 top
U7 "USBLC6-2SC6" SOT-23-6 249.33,949.32 r180 top
U8 "TCAN3414DR" "SOIC-8(0.154\", 3.90mm Width)" 4702.95,1335.14 r270 top
U9 "THVD1449DR" "SOIC-8(0.154\", 3.90mm Width)" 5046.25,1335.14 r270 top
U10 "CSD88537ND" SOIC-8 2891.89,662.91 r270 top
U11 "CSD88537ND" SOIC-8 4108.72,663.77 r270 top
U12 "CSD88537ND" SOIC-8 2673.21,662.91 r270 top
U13 "CSD88537ND" SOIC-8 3890.05,663.77 r270 top
U14 "CSD88537ND" SOIC-8 2454.55,662.91 r270 top
U15 "CSD88537ND" SOIC-8 3671.39,663.77 r270 top
U16 "CSD88537ND" SOIC-8 2235.88,662.91 r270 top
U17 "CSD88537ND" SOIC-8 3452.72,663.77 r270 top
U18 "DRV8711DCPR" HTSSOP-38-EP-4.4mm 2569.99,1256.15 r270 top
U19 "DRV8711DCPR" HTSSOP-38-EP-4.4mm 3786.83,1257.01 r270 top locked
U20 "CSD88537ND" SOIC-8 3449,3347.92 r90 top
U21 "CSD88537ND" SOIC-8 2233.01,3347.92 r90 top
U22 "CSD88537ND" SOIC-8 3667.66,3347.92 r90 top
U23 "CSD88537ND" SOIC-8 2451.68,3347.92 r90 top
U24 "CSD88537ND" SOIC-8 3886.33,3347.92 r90 top
U25 "CSD88537ND" SOIC-8 2670.35,3347.92 r90 top
U26 "CSD88537ND" SOIC-8 4105,3347.92 r90 top
U27 "CSD88537ND" SOIC-8 2889.01,3347.92 r90 top
U28 "DRV8711DCPR" HTSSOP-38-EP-4.4mm 3770.89,2754.68 r90 top
U29 "DRV8711DCPR" HTSSOP-38-EP-4.4mm 2554.9,2752.54 r90 top
U30 "ADS1115IDGSR" VSSOP-10 1529.33,1150.07 r0 top
X1 "24MHz" SMD2016-4P 336.72,1716.96 r270 top locked
X2 "32.7680KHZ" NX3215SA-32.768K-STD-MUA-8_ 335.82,1835.11 r0 top

## Footprints (in the part's own frame and the unit in brackets; to place one, negate y for a bottom-side part, rotate by r counter-clockwise, add the part's x,y. Pads: shape width x height; smd on the part's side, far side on the other; paste and mask are expansions set on the pad)
"13-WQFN-HR (3x2)" [mm]
  round 0.244 smd: 1(-0.694,1.194) 5(-0.694,-1.194) 7(0.694,-1.194) 11(0.694,1.194)
  rrect40% 0.65x0.25 smd: 2(-0.875,0.5) 3(-0.875,0) 4(-0.875,-0.5) 8(0.875,-0.5) 9(0.875,0) 10(0.875,0.5)
  rrect29% 0.35x0.65 smd: 6(0,-1.375) 12(0,1.375)
  rrect22% 0.45x1.45 smd: 13(0,0)
  Top Layer region: 1.2,-1.075 1.2,-1.225 1.196,-1.244 1.185,-1.26 1.169,-1.271 1.15,-1.275 1.15,-1.275 0.825,-1.275 0.806,-1.279 0.79,-1.29 0.779,-1.306 0.775,-1.325 0.775,-1.325 0.775,-1.65 0.771,-1.669 0.76,-1.685 0.744,-1.696 0.725,-1.7 0.725,-1.7 0.575,-1.7 0.55,-1.693 0.532,-1.675 0.525,-1.65 0.525,-1.65 0.525,-1.075 0.529,-1.056 0.54,-1.04 0.556,-1.029 0.575,-1.025 0.575,-1.025 1.15,-1.025 1.169,-1.029 1.185,-1.04 1.196,-1.056 1.2,-1.075 1.2,-1.075
  Top Layer region: -0.575,-1.7 -0.725,-1.7 -0.744,-1.696 -0.76,-1.685 -0.771,-1.669 -0.775,-1.65 -0.775,-1.65 -0.775,-1.325 -0.779,-1.306 -0.79,-1.29 -0.806,-1.279 -0.825,-1.275 -0.825,-1.275 -1.15,-1.275 -1.169,-1.271 -1.185,-1.26 -1.196,-1.244 -1.2,-1.225 -1.2,-1.225 -1.2,-1.075 -1.193,-1.05 -1.175,-1.032 -1.15,-1.025 -1.15,-1.025 -0.575,-1.025 -0.556,-1.029 -0.54,-1.04 -0.529,-1.056 -0.525,-1.075 -0.525,-1.075 -0.525,-1.65 -0.529,-1.669 -0.54,-1.685 -0.556,-1.696 -0.575,-1.7 -0.575,-1.7
  Top Layer region: -1.2,1.225 -1.196,1.244 -1.185,1.26 -1.169,1.271 -1.15,1.275 -1.15,1.275 -0.825,1.275 -0.806,1.279 -0.79,1.29 -0.779,1.306 -0.775,1.325 -0.775,1.325 -0.775,1.65 -0.771,1.669 -0.76,1.685 -0.744,1.696 -0.725,1.7 -0.725,1.7 -0.575,1.7 -0.55,1.693 -0.532,1.675 -0.525,1.65 -0.525,1.65 -0.525,1.075 -0.529,1.056 -0.54,1.04 -0.556,1.029 -0.575,1.025 -0.575,1.025 -1.15,1.025 -1.169,1.029 -1.185,1.04 -1.196,1.056 -1.2,1.075 -1.2,1.075
  Top Layer region: 0.575,1.7 0.725,1.7 0.744,1.696 0.76,1.685 0.771,1.669 0.775,1.65 0.775,1.65 0.775,1.325 0.779,1.306 0.79,1.29 0.806,1.279 0.825,1.275 0.825,1.275 1.15,1.275 1.169,1.271 1.185,1.26 1.196,1.244 1.2,1.225 1.2,1.225 1.2,1.075 1.193,1.05 1.175,1.032 1.15,1.025 1.15,1.025 0.575,1.025 0.556,1.029 0.54,1.04 0.529,1.056 0.525,1.075 0.525,1.075 0.525,1.65 0.529,1.669 0.54,1.685 0.556,1.696 0.575,1.7 0.575,1.7
  silkscreen extent -1.52,-1.59 1.1,1.59, body extent -1,-1.5 1,1.5, height 0.7
"64-LQFP (10x10)" [mm]
  rect 1.2x0.3 smd: 1(-5.75,3.75) 2(-5.75,3.25) 3(-5.75,2.75) 4(-5.75,2.25) 5(-5.75,1.75) 6(-5.75,1.25) 7(-5.75,0.75) 8(-5.75,0.25) 9(-5.75,-0.25) 10(-5.75,-0.75) 11(-5.75,-1.25) 12(-5.75,-1.75) 13(-5.75,-2.25) 14(-5.75,-2.75) 15(-5.75,-3.25) 16(-5.75,-3.75) 33(5.75,-3.75) 34(5.75,-3.25) 35(5.75,-2.75) 36(5.75,-2.25) 37(5.75,-1.75) 38(5.75,-1.25) 39(5.75,-0.75) 40(5.75,-0.25) 41(5.75,0.25) 42(5.75,0.75) 43(5.75,1.25) 44(5.75,1.75) 45(5.75,2.25) 46(5.75,2.75) 47(5.75,3.25) 48(5.75,3.75)
  rect 0.3x1.2 smd: 17(-3.75,-5.75) 18(-3.25,-5.75) 19(-2.75,-5.75) 20(-2.25,-5.75) 21(-1.75,-5.75) 22(-1.25,-5.75) 23(-0.75,-5.75) 24(-0.25,-5.75) 25(0.25,-5.75) 26(0.75,-5.75) 27(1.25,-5.75) 28(1.75,-5.75) 29(2.25,-5.75) 30(2.75,-5.75) 31(3.25,-5.75) 32(3.75,-5.75) 49(3.75,5.75) 50(3.25,5.75) 51(2.75,5.75) 52(2.25,5.75) 53(1.75,5.75) 54(1.25,5.75) 55(0.75,5.75) 56(0.25,5.75) 57(-0.25,5.75) 58(-0.75,5.75) 59(-1.25,5.75) 60(-1.75,5.75) 61(-2.25,5.75) 62(-2.75,5.75) 63(-3.25,5.75) 64(-3.75,5.75)
  silkscreen extent -6.63,-5.36 5.28,5.36, body extent -6,-6 6,6, height 1.6
178.6165.0002 [mm]
  rect 2.2x2.2 hole 1.5 paste-2539.97 mask+0.051: 1(-6.4,1.25)
  round 2.2 hole 1.5 paste-2539.97 mask+0.051: 2(-2.9,1.25) 3(2.9,1.25) 4(6.4,1.25) 5(6.4,-1.25) 6(2.9,-1.25) 7(-2.9,-1.25) 8(-6.4,-1.25)
  round 0 hole 2.5 unplated paste-2539.97: ""(0,0)
  silkscreen extent -10.03,-3.05 10.03,3.05, body extent -10,-3 10,3, height 17.5
B3U-1000P [mm] "SWITCH TACTILE SPST-NO 0.05A 12V"
  rect 0.82x1.72 smd: 1(-1.7,0) 2(1.7,0)
  silkscreen extent -1.57,-1.3 1.57,1.3, body extent -2,-1.26 2,1.24, height 1.6
Cap-0201 [mm]
  rect 0.3x0.3 smd mask+0.055: 1(-0.3,0) 2(0.3,0)
  silkscreen extent -0.53,-0.23 0.53,0.23, body extent -0.3,-0.15 0.3,0.15, height 0.28
Cap-0402 [mil]
  rect 18x25 smd mask+2.36: 1(-18.5,0) 2(18.5,0)
  silkscreen extent -31,-16 31,16, body extent -20,-10 20,10, height 19
cap-0402 [mil]
  rect 18x25 smd mask+2.36: 1(-18.5,0) 2(18.5,0)
  silkscreen extent -31,-16 31,16, body extent -20,-10 20,10, height 19
Cap-0603 [mil]
  rect 30x35 smd mask+2.36: 1(-30,0) 2(30,0)
  silkscreen extent -49,-21 49,21, body extent -32,-16 31,16, height 34
Cap-0805 [mil] "SMD 0805"
  rect 40x60 smd mask+2.76: 1(-40,0) 2(40,0)
  silkscreen extent -64,-34 64,34, body extent -39,-25 39,25, height 30
Cap-1206 [mil] "SMD 1206"
  rect 60x70 smd: 1(-50,0) 2(50,0)
  silkscreen extent -84,-39 84,39, body extent -63,-31 63,32, height 39
DB128L-5.08-3P-OG-S [mm]
  rect 2.4x2.4 hole 1.6 paste-2539.97 mask+0.051: 1(-5.08,0)
  round 2.4 hole 1.6 paste-2539.97 mask+0.051: 2(0,0) 3(5.08,0)
  silkscreen extent -7.62,-5.1 8.12,5, body extent -7.62,-4.99 8.22,5.01, height 13.97
DB128L-5.08-4P-GN-S [mm]
  rect 2.8x2.8 hole 1.5 slot 1.575 at 0 deg paste-2539.97 mask+0.05: 1(-7.62,0)
  round 2.8 hole 1.5 slot 1.575 at 0 deg paste-2539.97 mask+0.05: 2(-2.54,0) 3(2.54,0) 4(7.62,0)
  silkscreen extent -10.03,-5 10.92,5.1, body extent -10.16,-4.88 10.76,5.12, height 14
DFN-2(0.3x0.6) [mm]
  rect 0.27x0.26 smd mask+0.05: 1(-0.195,0) 2(0.195,0)
  silkscreen extent -0.41,-0.2 0.41,0.2, body extent -0.3,-0.15 0.3,0.15, height 0.3
DFN-6(3x3) [mm]
  rect 0.8x0.5 smd paste+0 mask+0.051: 1(-1.6,0.95) 2(-1.6,0) 3(-1.6,-0.95) 4(1.6,-0.95) 5(1.6,0) 6(1.6,0.95)
  rect 1.55x2.3 smd paste+0 mask+0.051: 7(0,0)
  silkscreen extent -2.26,-1.52 1.52,1.52, body extent -1.5,-1.5 1.5,1.5, height 1.04
"Diode 1610" [mm]
  rect 0.4x1 smd paste+0 mask+0.051: 1(-0.55,0) 2(0.55,0)
  silkscreen extent -1.27,-0.61 0.88,0.62, body extent -0.8,-0.5 0.8,0.5, height 0.57
DSIC03LSGET [mil]
  rect 90x60 smd paste+0 mask+2: 1(-177.16,100) 2(-177.16,0) 3(-177.16,-100) 4(177.17,-100) 5(177.16,0) 6(177.17,100)
  silkscreen extent -118,-150 118,150, body extent -183,-150 183,150, height 163
Fuse-0805 [mm]
  rect 1x1.7 smd: 1(-1.1,0) 2(1.1,0)
  silkscreen extent -0.41,-0.81 0.41,0.81, body extent -1.1,-0.75 1.1,0.75, height 1.24
HC-RJ45-5622-1-6-Y [mil]
  round 60 hole 39.37 paste-99999 mask+2: 1(175,175) 2(125,75) 3(74.99,175) 4(25,75) 5(-25,175) 6(-75,75) 7(-125.01,175) 8(-175,75)
  round 0 hole 125.98 unplated paste-99999: ""(-225,-175) ""(225,-175)
  silkscreen extent -300,-467 300,225, body extent -299,-478 299,223, height 465
HDR1X2_ [mm] "CONN HEADER VERT 2POS 2.54MM"
  rect 1.5x1.5 hole 0.9: 1(0,0)
  round 1.5 hole 0.9: 2(2.54,0)
  silkscreen extent -1.27,-1.27 3.81,1.27, body extent -1.27,-1.27 3.81,1.27, height 8.44
HDR1X3_ [mm] "Connector; Header; 3 Position"
  rect 1.5x1.5 hole 0.9: 1(0,0)
  round 1.5 hole 0.9: 2(2.54,0) 3(5.08,0)
  silkscreen extent -1.27,-1.27 6.35,1.27, body extent -1.27,-1.24 6.35,1.25, height 8.54
HTSSOP-38-EP-4.4mm [mm]
  rect 1.6x0.3 smd paste+0 mask+0.051: 1(-2.8,4.5) 2(-2.8,4) 3(-2.8,3.5) 4(-2.8,3) 5(-2.8,2.5) 6(-2.8,2) 7(-2.8,1.5) 8(-2.8,1) 9(-2.8,0.5) 10(-2.8,0) 11(-2.8,-0.5) 12(-2.8,-1) 13(-2.8,-1.5) 14(-2.8,-2) 15(-2.8,-2.5) 16(-2.8,-3) 17(-2.8,-3.5) 18(-2.8,-4) 19(-2.8,-4.5) 20(2.8,-4.5) 21(2.8,-4) 22(2.8,-3.5) 23(2.8,-3) 24(2.8,-2.5) 25(2.8,-2) 26(2.8,-1.5) 27(2.8,-1) 28(2.8,-0.5) 29(2.8,0) 30(2.8,0.5) 31(2.8,1) 32(2.8,1.5) 33(2.8,2) 34(2.8,2.5) 35(2.8,3) 36(2.8,3.5) 37(2.8,4) 38(2.8,4.5)
  rect 2.9x4.8 smd paste+0 mask+0.051: 39(0,0)
  silkscreen extent -3.85,-4.88 1.83,4.88, body extent -3.2,-4.83 3.2,4.84, height 1.3
"IND-0603 (1608 Metric)" [mm] "0.063\" L x 0.032\" W (1.60mm x 0.80mm)"
  rect 0.6x0.8 smd: 1(-0.7,0) 2(0.7,0)
  silkscreen extent -0.2,-0.46 0.23,0.46, body extent -0.8,-0.4 0.8,0.4, height 0.78
LED-0603 [mm]
  rect 0.5x1 smd: 1(-0.75,0) 2(0.75,0)
  silkscreen extent -1.12,-0.66 1.75,0.66, body extent -0.82,-0.37 0.82,0.36, height 0.68
"Net Tie Pad" [mil]
  rect 18x25 smd mask-10: 1(-18.5,0) 2(18.5,0)
  Top Layer region: -15,-5 15,-5 15,5 -15,5
NX3215SA-32.768K-STD-MUA-8_ [mm]
  rect 1x1.8 smd: 1(-1.25,0) 2(1.25,0)
  silkscreen extent -0.51,-0.79 0.51,0.79, body extent -1.6,-0.75 1.6,0.75, height 0.8
Res-0402 [mil]
  rect 18x25 smd mask+2.17: 1(-18.5,0) 2(18.5,0)
  silkscreen extent -32,-17 32,16, body extent -23,-11 23,11, height 16
Res-0603 [mil]
  rect 30x35 smd: 1(-30,0) 2(30,0)
  silkscreen extent -48,-21 48,21, body extent -31,-17 31,17, height 18
RES-0805 [mil] "SMD 0805"
  rect 40x50 smd: 1(-40,0) 2(40,0)
  silkscreen extent -64,-29 64,29, body extent -39,-25 39,24, height 24
RES-2010 [mm]
  rect 0.9x2.8 smd: 1(-2.35,0) 2(2.35,0)
  silkscreen extent -2.92,-1.52 2.92,1.52, body extent -2.5,-1.25 2.5,1.25, height 0.6
RVT1H470M0607 [mm]
  rect 3.5x1.6 smd: 1(-2.8,0) 2(2.8,0)
  silkscreen extent -4.27,-3.33 3.32,3.33, body extent -3.5,-3.3 3.5,3.3, height 7.7
SMB_ [mm]
  rect 2.8x2.4 smd: 1(-2.3,0) 2(2.3,0)
  silkscreen extent -2.21,-1.9 4.83,1.91, body extent -2.7,-1.8 2.7,1.8, height 2.3
SMD2016-4P [mm]
  rect 1x0.8 smd paste+0 mask+0.051: 1(-0.75,-0.6) 2(0.75,-0.6) 3(0.75,0.6) 4(-0.75,0.6)
  silkscreen extent -1.42,-0.84 1.04,0.84, body extent -1,-0.8 1,0.8, height 0.47
SOD-123 [mm]
  rect 0.95x0.9 smd: 1(-1.575,0) 2(1.575,0)
  silkscreen extent -1.37,-0.8 2.82,0.8, body extent -1.82,-0.78 1.83,0.78, height 1.5
SOIC-8 [mm]
  rect 1.55x0.6 smd: 1(-2.7,1.905) 2(-2.7,0.635) 3(-2.7,-0.635) 4(-2.7,-1.905) 5(2.7,-1.905) 6(2.7,-0.635) 7(2.7,0.635) 8(2.7,1.905)
  silkscreen extent -3.76,-2.49 1.99,2.49, body extent -3,-2.45 3,2.45, height 1.7
"SOIC-8(0.154\", 3.90mm Width)" [mm]
  rect 1.55x0.6 smd: 1(-2.7,1.905) 2(-2.7,0.635) 3(-2.7,-0.635) 4(-2.7,-1.905) 5(2.7,-1.905) 6(2.7,-0.635) 7(2.7,0.635) 8(2.7,1.905)
  silkscreen extent -3.79,-2.51 1.8,2.51, body extent -3.01,-2.45 3.01,2.45, height 1.63
SON-8(5x6) [mm]
  rect 1.372x0.71 smd paste-0.15: 1(-1.385,1.905) 2(-1.385,0.635) 3(-1.385,-0.635) 4(-1.385,-1.905)
  rect 0.5x0.5 smd paste-1 mask+0: 5(1.385,0) 6(1.385,0.635) 7(1.385,-0.635) 8(2.032,0)
  Top Layer region: 4.841,1.55 4.251,1.55 4.251,0.99 4.841,0.99 4.841,0.28 4.251,0.28 4.251,-0.28 4.841,-0.28 4.841,-0.99 4.251,-0.99 4.251,-1.55 4.841,-1.55 4.841,-2.26 0.401,-2.26 0.401,2.26 4.841,2.26
  silkscreen extent -2.37,-2.58 4.39,2.58, body extent -1.61,-2.5 4.39,2.5, height 1.05
SOT-23 [mm] "TRANS NPN 40V 0.6A SOT23"
  rect 0.82x0.92 smd: 1(-0.95,-1) 2(0.95,-1) 3(0,1)
  silkscreen extent -1.68,-1.3 1.55,0.81, body extent -1.5,-1.25 1.5,1.25, height 1.05
Sot-23 [mm] "TRANS NPN 40V 0.6A SOT23"
  rect 0.82x0.92 smd: 1(-0.95,-1) 2(0.95,-1) 3(0,1)
  silkscreen extent -1.68,-1.3 1.55,0.81, body extent -1.5,-1.25 1.5,1.25, height 1.05
SOT-23-5 [mm]
  rect 1.1x0.6 smd: 1(-1.3,0.95) 2(-1.3,0) 3(-1.3,-0.95) 4(1.3,-0.95) 5(1.3,0.95)
  silkscreen extent -2.13,-1.5 0.88,1.5, body extent -1.4,-1.45 1.4,1.45, height 1.45
SOT-23-6 [mm]
  rect 1.22x0.62 smd: 1(-1.31,0.95) 2(-1.31,0) 3(-1.31,-0.95) 4(1.31,-0.95) 5(1.31,0) 6(1.31,0.95)
  silkscreen extent -2.18,-1.52 0.86,1.52, body extent -1.5,-1.5 1.5,1.5, height 1.47
SOT-323-5 [mm]
  rect 1x0.35 smd: 1(-0.95,0.65) 2(-0.95,0) 3(-0.95,-0.65) 4(0.95,-0.65) 5(0.95,0.65)
  silkscreen extent -1.73,-1.12 0.51,1.12, body extent -1.05,-1.05 1.05,1.05, height 1
SRP1265A-150M [mm]
  rect 2.924x5.82 smd paste+0 mask+0.051: 1(5.628,0) 2(-5.628,0)
  silkscreen extent -6.33,-6.33 6.33,6.33, body extent -6.47,-6.25 6.43,6.25, height 6.31
SSOP-28-208mil [mm]
  rect 1.85x0.45 smd: 1(-3.4,4.225) 2(-3.4,3.575) 3(-3.4,2.925) 4(-3.4,2.275) 5(-3.4,1.625) 6(-3.4,0.975) 7(-3.4,0.325) 8(-3.4,-0.325) 9(-3.4,-0.975) 10(-3.4,-1.625) 11(-3.4,-2.275) 12(-3.4,-2.925) 13(-3.4,-3.575) 14(-3.4,-4.225) 15(3.4,-4.225) 16(3.4,-3.575) 17(3.4,-2.925) 18(3.4,-2.275) 19(3.4,-1.625) 20(3.4,-0.975) 21(3.4,-0.325) 22(3.4,0.325) 23(3.4,0.975) 24(3.4,1.625) 25(3.4,2.275) 26(3.4,2.925) 27(3.4,3.575) 28(3.4,4.225)
  silkscreen extent -4.7,-5.21 2.72,5.21, body extent -3.88,-5.17 3.88,5.17, height 2.15
SVZ1VM101E09E00RAXXX [mm]
  rect 3.5x1.2 smd paste+0 mask+0.051: 1(-2.67,0) 2(2.67,0)
  silkscreen extent -3.3,-3.3 3.3,3.3, body extent -3.5,-3.25 3.5,3.25, height 4.21
TC2030-IDC_ [mm] "CABLE ADAPTER 6 POS"
  round 0.787 smd: 1(-1.27,-0.635) 1(-1.27,-0.635) 2(-1.27,0.635) 3(0,-0.635) 4(0,0.635) 5(1.27,-0.635) 6(1.27,0.635)
  round 0 hole 2.375 unplated: MP1(-2.54,-2.54) MP2(0.635,-2.54) MP3(0.635,2.54) MP4(-2.54,2.54)
  round 0 hole 0.991 unplated: MP5(-2.54,0) MP6(2.54,-1.016) MP7(2.54,1.016)
  silkscreen extent -4.04,-4.06 3.33,4.08
Test-point [mil]
  oct 60x60 smd: 1(0,0)
  silkscreen extent -37,-37 37,37
U263-163N-4BQC65 [mm]
  rect 0.3x0.87 smd: A1(-2.75,0.865) A4(-1.25,0.865) A5(-0.75,0.865) A6(-0.25,0.865) A7(0.25,0.865) A8(0.75,0.865) A9(1.25,0.865) A12(2.75,0.865) B1(2.75,-0.865) B4(1.25,-0.865) B5(0.75,-0.865) B6(0.25,-0.865) B7(-0.25,-0.865) B8(-0.75,-0.865) B9(-1.25,-0.865) B12(-2.75,-0.865)
  round 0 hole 0.52 unplated: MH(-3.75,0)
  round 0 hole 0.6 slot 0.72 at 0 deg unplated: MH(3.75,0)
  oval 1.35x1.1 hole 0.6 slot 0.85 at 0 deg: S1(-2.4,2.15) S2(2.4,2.15) S3(2.4,-2.15) S4(-2.4,-2.15)
  silkscreen extent -4.39,-1.7 4.39,1.7, body extent -4.49,-2.28 4.45,2.32, height 6.55
UCD-220uF-10mmDia [mm] "0.406\" L x 0.406\" W (10.30mm x 10.30mm)"
  rect 4x2.5 smd: 1(-4,0) 2(4,0)
  silkscreen extent -5.95,-5.21 5.13,5.21, body extent -5.45,-5.15 5.45,5.15, height 10.8
VSSOP-10 [mm]
  rect 1.45x0.3 smd paste+0 mask+0.05: 1(-2.2,1) 2(-2.2,0.5) 3(-2.2,0) 4(-2.2,-0.5) 5(-2.2,-1) 6(2.2,-1) 7(2.2,-0.5) 8(2.2,0) 9(2.2,0.5) 10(2.2,1)
  silkscreen extent -3.17,-1.55 1.47,1.55, body extent -2.45,-1.5 2.45,1.5, height 1.07
WS2812D-F5 [mm]
  round 1.1 hole 0.72 paste-2539.97 mask+0.051: 1(1.95,0) 2(0.65,0) 3(-0.65,0) 4(-1.95,0)
  silkscreen extent -2.91,-2.9 2.51,2.9, body extent -2.9,-2.9 2.51,2.9, height 8.7

## Part data
C1 C2: library part UCD1H221MNL1GS, "CAP ALUM 220UF 20% 50V SMD", Case/Package=Radial, LCSC Part Number=C116211, Leakage Current=3uA, Manufacturer=Nichicon, Max Operating Temperature=105°C, Min Operating Temperature=-55°C, Package Quantity=1, Ripple Current=700mA, Supplier Part Number 1=493-6390-1-ND, Tolerance=20%, Voltage=50V, Capacitance=220uF, Category="Aluminum Electrolytic Capacitors", ComponentLink1Description=https://datasheet.ciiva.com/11776/0900766b80ebdadd-11776792.pdf?src-supplier=RSComponents, ComponentLink1URL=https://datasheet.ciiva.com/11776/0900766b80ebdadd-11776792.pdf?src-supplier=RSComponents, ComponentLink2Description=https://datasheet.ciiva.com/5362/e-cd-22158-5362489.pdf?src-supplier=Mouser, ComponentLink2URL=https://datasheet.ciiva.com/5362/e-cd-22158-5362489.pdf?src-supplier=Mouser, ComponentLink3Description=https://datasheet.ciiva.com/11684/e-cd-11684678.pdf?src-supplier=Avnet, ComponentLink3URL=https://datasheet.ciiva.com/11684/e-cd-11684678.pdf?src-supplier=Avnet, ComponentLink4Description=https://datasheet.ciiva.com/15037/e-cd-15037119.pdf?src-supplier=Digi-Key, ComponentLink4URL=https://datasheet.ciiva.com/15037/e-cd-15037119.pdf?src-supplier=Digi-Key, ComponentLink5Description=https://datasheet.ciiva.com/16393/e-cd-16393493.pdf?src-supplier=Future+Electronics, ComponentLink5URL=https://datasheet.ciiva.com/16393/e-cd-16393493.pdf?src-supplier=Future+Electronics, ComponentLink6Description=https://datasheet.ciiva.com/17354/e-cd-17354606.pdf?src-supplier=Avnet+Europe, ComponentLink6URL=https://datasheet.ciiva.com/17354/e-cd-17354606.pdf?src-supplier=Avnet+Europe, Construction=Cylindrical, Diameter=10mm, Dissipation Factor=0.1%, Features="General Purpose", Height=10mm, Height - Seated (Max)=0.394inch, Impedance=160mR, Item Type=Capacitor, Lead Free="Lead Free", Length=10mm, Life (Hours)=5000Hour, Manufacturer Part Number=UCD1H221MNL1GS, Mount="Surface Mount,PCB", Packaging="Tape and Reel", Pricing 1="1=0.85000, 10=0.60200, 50=0.45480, 100=0.39620 (USD)", Radiation Hardening=No, RoHS=Yes, RoHS Compliant=Yes, Series=CD, Supplier 1=Digi-Key, Termination=SMD/SMT, Voltage Rating=50V, Voltage Rating (DC)=50V
C3: library part RVT1H470M0607, "47uF 50V 66mA@120Hz ±20% SMD,D6.3xL7.7mm Aluminum Electrolytic Capacitors - SMD ROHS", LCSC Part Number=C72523, Manufacturer=ROQANG, Package=SMD,D6.3xL7.7mm, ComponentLink1Description=LCSC, ComponentLink1URL=https://www.lcsc.com/product-detail/Aluminum-Electrolytic-Capacitors-SMD_ROQANG-RVT1H470M0607_C72523.html, Item Type=Capacitor, Manufacturer Part Number=RVT1H470M0607
C4: library part CC0805JRX7R0BB223, "CAP CER 0.022UF 100V X7R 0805", Case/Package=0805, Dielectric=X7R, LCSC Part Number=C576993, Manufacturer=Yageo, Max Operating Temperature=125°C, Min Operating Temperature=-55°C, Tolerance=5%, ComponentLink1Description=https://datasheet.ciiva.com/11494/upy-np0x7r-mv-100-to-630v-9-11494760.pdf?src-supplier=Avnet, ComponentLink1URL=https://datasheet.ciiva.com/11494/upy-np0x7r-mv-100-to-630v-9-11494760.pdf?src-supplier=Avnet, Construction=Flat, Depth=1.25mm, Height=0.85mm, Item Type=Capacitors, Length=2mm, Manufacturer Part Number=CC0805JRX7R0BB223, Mounting Technology="Surface Mount", Pricing="1=0.13, 10=0.07, 50=0.0488, 100=0.0421, 500=0.03086, 1000=0.02736 (USD)", RoHS=Yes, RoHS Compliant=Yes, Stock=2257, Supplier=Digikey
C5: library part GRM21BR61H106ME43L, "CAP CER 10UF 50V X5R 0805", LCSC Part Number=C2190942, Manufacturer=Murata, Supplier Part Number 1=490-18664-1-ND, Category="Ceramic Capacitors", Manufacturer Part Number=GRM21BR61H106ME43L, Pricing 1="1=0.44000, 10=0.30700, 50=0.21500, 100=0.18420, 500=0.13818, 1000=0.11668 (USD)", RoHS=Yes, Stock 1=26, Supplier 1=Digi-Key
C6 C8 C18 C52 C53 C54 C55 C57 C59 C68 C69 C70 C71 C73 C75: library part CL10A105KB8NNNC, "CAP CER 1UF 50V X5R 0603", Case Code (Imperial)=0603, Case Code (Metric)=1608, Dielectric=X5R, LCSC Part Number=C15849, Manufacturer=Samsung, Max Operating Temperature=85°C, Min Operating Temperature=-55°C, Tolerance=10%, Voltage Rating=50V, Case/Package=0603, Category="Ceramic Capacitors", ComponentLink1Description=https://datasheet.ciiva.com/26877/getdatasheetpartid-753736-26877879.pdf?src-supplier=Verical, ComponentLink1URL=https://datasheet.ciiva.com/26877/getdatasheetpartid-753736-26877879.pdf?src-supplier=Verical, Depth=0.8mm, Item Type=Capacitor, Length=1.6mm, Manufacturer Part Number=CL10A105KB8NNNC, Material=4241ConductorMaterial, Mounting Technology="Surface Mount", Packaging="Tape and Reel", Pricing="4000=0.01632, 8000=0.01595, 16000=0.01557, 24000=0.0152, 32000=0.01482 (USD)", Radiation Hardening=No, RoHS=Yes, RoHS Compliant=Yes, Series=CL, Stock=780446, Supplier=Avnet, Supplier Part Number=CL10A105KB8NNNC, Voltage Rating (DC)=50V
C7 C9 C16: library part CL10B104KB8WPNC, "CAP CER 0.1UF 50V X7R 0603", Case Code (Imperial)=0603, Case Code (Metric)=1608, LCSC Part Number=C307348, Max Operating Temperature=125°C, Min Operating Temperature=-55°C, Ratings=AEC-Q200, Supplier Part Number=2575919, Tolerance=10%, Voltage Rating=50V, Case/Package=0603, Category="Ceramic Capacitors", ComponentLink1Description=LCSC, ComponentLink2Description=http://www.farnell.com/datasheets/2710560.pdf?src-supplier=Farnell, ComponentLink2URL=http://www.farnell.com/datasheets/2710560.pdf?src-supplier=Farnell, ComponentLink3Description=http://www.samsungsem.com/kr/support/product-search/mlcc/CL10B104KB8WPNC.jsp?src-supplier=Digi-Key, ComponentLink3URL=http://www.samsungsem.com/kr/support/product-search/mlcc/CL10B104KB8WPNC.jsp?src-supplier=Digi-Key, ComponentLink4Description=http://www.farnell.com/datasheets/2710560.pdf?src-supplier=Element14, ComponentLink4URL=http://www.farnell.com/datasheets/2710560.pdf?src-supplier=Element14, ComponentLink5Description=https://datasheet.octopart.com/CL10B104KB8WPNC-Samsung-Electro-Mechanics-datasheet-120093645.pdf?src-supplier=Future+Electronics, ComponentLink5URL=https://datasheet.octopart.com/CL10B104KB8WPNC-Samsung-Electro-Mechanics-datasheet-120093645.pdf?src-supplier=Future+Electronics, ComponentLink6Description=http://www.farnell.com/datasheets/2710560.pdf?src-supplier=Newark, ComponentLink6URL=http://www.farnell.com/datasheets/2710560.pdf?src-supplier=Newark, ComponentLink7Description=http://www.samsungsem.com/servlet/FileDownload?type=spec&file=CL10B104KB8WPNC.pdf&src-supplier=Avnet, ComponentLink7URL=http://www.samsungsem.com/servlet/FileDownload?type=spec&file=CL10B104KB8WPNC.pdf&src-supplier=Avnet, ComponentLink8Description=https://datasheet.octopart.com/CL10B104KB8WPNC-Samsung-datasheet-8326407.pdf?src-supplier=TME, ComponentLink8URL=https://datasheet.octopart.com/CL10B104KB8WPNC-Samsung-datasheet-8326407.pdf?src-supplier=TME, Height=900um, Item Type=Capacitor, Lead Free=5697LeadFree, Material=4241ConductorMaterial, Mounting Technology="Surface Mount", Packaging="Cut Tape", Pricing="100=0.021, 500=0.019, 1000=0.015, 2000=0.01 (GBP)", RoHS=Yes, RoHS Compliant=Yes, Series=CL, Stock=400, Supplier=Rs, Voltage Rating (DC)=50V
C10 C19 C20: library part UMK316AB7475KL-T, "CAP CER 4.7UF 50V X7R 1206", Case Code (Imperial)=1206, Case Code (Metric)=3216, Dielectric=X7R, LCSC Part Number=C92853, Manufacturer="Taiyo Yuden", Max Operating Temperature=125°C, Min Operating Temperature=-55°C, Package Quantity=2000, Tolerance=10%, Voltage Rating=50V, Case/Package=1206, ComponentLink1Description=https://datasheet.ciiva.com/170/umk316ab7475kl-t-ss-170928.pdf?src-supplier=Digikey, ComponentLink1URL=https://datasheet.ciiva.com/170/umk316ab7475kl-t-ss-170928.pdf?src-supplier=Digikey, ComponentLink2Description=https://datasheet.ciiva.com/2990/umk316ab7475kl-t-ss-2990070.pdf?src-supplier=Avnet, ComponentLink2URL=https://datasheet.ciiva.com/2990/umk316ab7475kl-t-ss-2990070.pdf?src-supplier=Avnet, ComponentLink3Description=https://datasheet.ciiva.com/15922/1010umk316ab7475kl-t-15922628.pdf?src-supplier=Onlinecomponents.com, ComponentLink3URL=https://datasheet.ciiva.com/15922/1010umk316ab7475kl-t-15922628.pdf?src-supplier=Onlinecomponents.com, ComponentLink4Description=https://datasheet.ciiva.com/7975/1481447-7975911.pdf?src-supplier=Element14, ComponentLink4URL=https://datasheet.ciiva.com/7975/1481447-7975911.pdf?src-supplier=Element14, ComponentLink5Description=https://datasheet.ciiva.com/5413/mlcc-all-e-541559-5413006.pdf?src-supplier=Mouser, ComponentLink5URL=https://datasheet.ciiva.com/5413/mlcc-all-e-541559-5413006.pdf?src-supplier=Mouser, Construction=Flat, Depth=1.6mm, Height=1.6mm, Item Type=Capacitor, Length=3.2mm, Manufacturer Part Number=UMK316AB7475KL-T, Mounting Technology="Surface Mount", Packaging="Tape and Reel", Pins=2, Pricing="1=0.3, 10=0.198, 50=0.146, 100=0.1189, 500=0.09386, 1000=0.07925 (USD)", Radiation Hardening=No, Reach SVHC Compliant=Unknown, RoHS=Yes, RoHS Compliant=Yes, Series=M, Stock=392550, Supplier=Digikey, Termination=SMD/SMT, Voltage Rating (DC)=50V, Width=1.6mm
C11 C12: library part CC1206JKX7R9BB224, "CAP CER 0.22UF 50V X7R 1206", LCSC Part Number=C527274, Manufacturer=Yageo, Supplier Part Number=4639209, Category="Ceramic Capacitors", ComponentLink1Description=https://datasheet.ciiva.com/13210/upy-gp-np0-16v-to-50v-8-13210060.pdf?src-supplier=Mouser, ComponentLink1URL=https://datasheet.ciiva.com/13210/upy-gp-np0-16v-to-50v-8-13210060.pdf?src-supplier=Mouser, ComponentLink2Description=https://datasheet.ciiva.com/11466/upy-gphc-x7r-6-3v-to-50v-8-11466351.pdf?src-supplier=Avnet, ComponentLink2URL=https://datasheet.ciiva.com/11466/upy-gphc-x7r-6-3v-to-50v-8-11466351.pdf?src-supplier=Avnet, Item Type=Capacitor, Manufacturer Part Number=CC1206JKX7R9BB224, Pricing="3000=0.0381, 9000=0.0366, 15000=0.036, 30000=0.0351, 60000=0.0337 (USD)", RoHS=Yes, Stock=3000, Supplier="Future Electronics"
C13 C14 C15: library part GRM31CR61E476ME44L, "CAP CER 47UF 25V X5R 1206", Dielectric=X5R, LCSC Part Number=C403725, Manufacturer=Murata, Supplier Part Number 1=490-16268-2-ND, Tolerance=20%, Voltage Rating (DC)=25V, Capacitance=47uF, Category="Ceramic Capacitors", ComponentLink1Description=https://search.murata.co.jp/Ceramy/image/img/A01X/partnumbering_e_01.pdf?src-supplier=Digi-Key, ComponentLink1URL=https://search.murata.co.jp/Ceramy/image/img/A01X/partnumbering_e_01.pdf?src-supplier=Digi-Key, Item Type=Capacitor, Length=3.2mm, Manufacturer Part Number=GRM31CR61E476ME44L, RoHS=Yes, Supplier 1=Digi-Key, Thickness=1.6mm, Width=1.6mm
C17: library part CC0402CRNPO9BN6R8, "CAP CER 6.8PF 50V C0G/NPO 0402", Case Code (Imperial)=0402, Case Code (Metric)=1005, Dielectric=C0G, Insulation Resistance=10GR, LCSC Part Number=C189470, Manufacturer=Yageo, Max Operating Temperature=125°C, Min Operating Temperature=-55°C, Supplier Part Number=3247368, Tolerance=2%, Voltage Rating=50V, Case/Package=0402, Category="Ceramic Capacitors", ComponentLink1Description=https://datasheet.ciiva.com/11587/upy-gp-np0-16v-to-50v-8-11587182.pdf?src-supplier=Avnet, ComponentLink1URL=https://datasheet.ciiva.com/11587/upy-gp-np0-16v-to-50v-8-11587182.pdf?src-supplier=Avnet, Construction=Flat, Depth=0.5mm, Height=0.5mm, Item Type=Capacitor, Length=1mm, Manufacturer Part Number=CC0402CRNPO9BN6R8, Mounting Technology="Surface Mount", Packaging="Tape and Reel", Pricing="10000=0.0024, 40000=0.0022, 150000=0.0021, 400000=0.002, 1000000=0.0019 (USD)", Radiation Hardening=No, RoHS=Yes, RoHS Compliant=Yes, Series=CC, Stock=200000, Supplier="Future Electronics", Termination=SMD/SMT, Voltage Rating (DC)=50V, Weight=2.3E-05oz, Width=0.5mm
C21 C22: library part GRM155R61E225KE11D, "CAP CER 2.2UF 25V X5R 0402", Capacitance=2.2uF, Case Code (Imperial)=0402, Case Code (Metric)=1005, Dielectric=X5R, LCSC Part Number=C385032, Manufacturer=Murata, Max Operating Temperature=85°C, Min Operating Temperature=-55°C, Package Quantity=10000, Resistor Type=Ceramic, Tolerance=10%, Voltage Rating=25V, Case/Package=0402, Category="Ceramic Capacitors", ComponentLink1Description=http://www.mouser.com/ds/2/281/c02e-2905.pdf?src-supplier=Mouser, ComponentLink1URL=http://www.mouser.com/ds/2/281/c02e-2905.pdf?src-supplier=Mouser, ComponentLink2Description=http://search.murata.co.jp/Ceramy/image/img/A01X/G101/ENG/GRM155R61E225KE11-01.pdf?src-supplier=Digi-Key, ComponentLink2URL=http://search.murata.co.jp/Ceramy/image/img/A01X/G101/ENG/GRM155R61E225KE11-01.pdf?src-supplier=Digi-Key, ComponentLink3Description=http://search.murata.co.jp/Ceramy/image/img/A01X/partnumbering_e_01.pdf?src-supplier=Digi-Key, ComponentLink3URL=http://search.murata.co.jp/Ceramy/image/img/A01X/partnumbering_e_01.pdf?src-supplier=Digi-Key, ComponentLink4Description=http://psearch.en.murata.com/capacitor/product/GRM155R61E225KE11%23.pdf?src-supplier=Avnet, ComponentLink4URL=http://psearch.en.murata.com/capacitor/product/GRM155R61E225KE11%23.pdf?src-supplier=Avnet, Height=0.5mm, Item Type=Capacitor, Lead Free="Lead Free", Length=1mm, Manufacturer Part Number=GRM155R61E225KE11D, Material=Ceramic, Mount="Surface Mount", Packaging="Tape and Reel", Pricing 1="10000=0.03830, 20000=0.03623, 40000=0.03416, 60000=0.03209, 80000=0.03002, 100000=0.02795, 1000000=0.02588 (USD)", RoHS=Yes, RoHS Compliant=Yes, Stock 1=210000, Supplier 1=Avnet, Supplier Part Number 1=GRM155R61E225KE11D, Termination=SMD/SMT, Thickness=0.022inch, Voltage Rating (DC)=25V, Weight=0.000212oz, Width=0.5mm